# Altium PCB PMP41115.PcbDoc (part 1 of 6)
Units mm, origin at the board's own origin, x right, y up, seen from the top; angles counter-clockwise.
Board outline 102.92 x 46.74 mm, 4 copper layers (Top Layer, Signal Layer 1, Signal Layer 2, Bottom Layer), stack 1.016 mm thick; 174 components, 114 nets, 547 pads, 2622 vias.
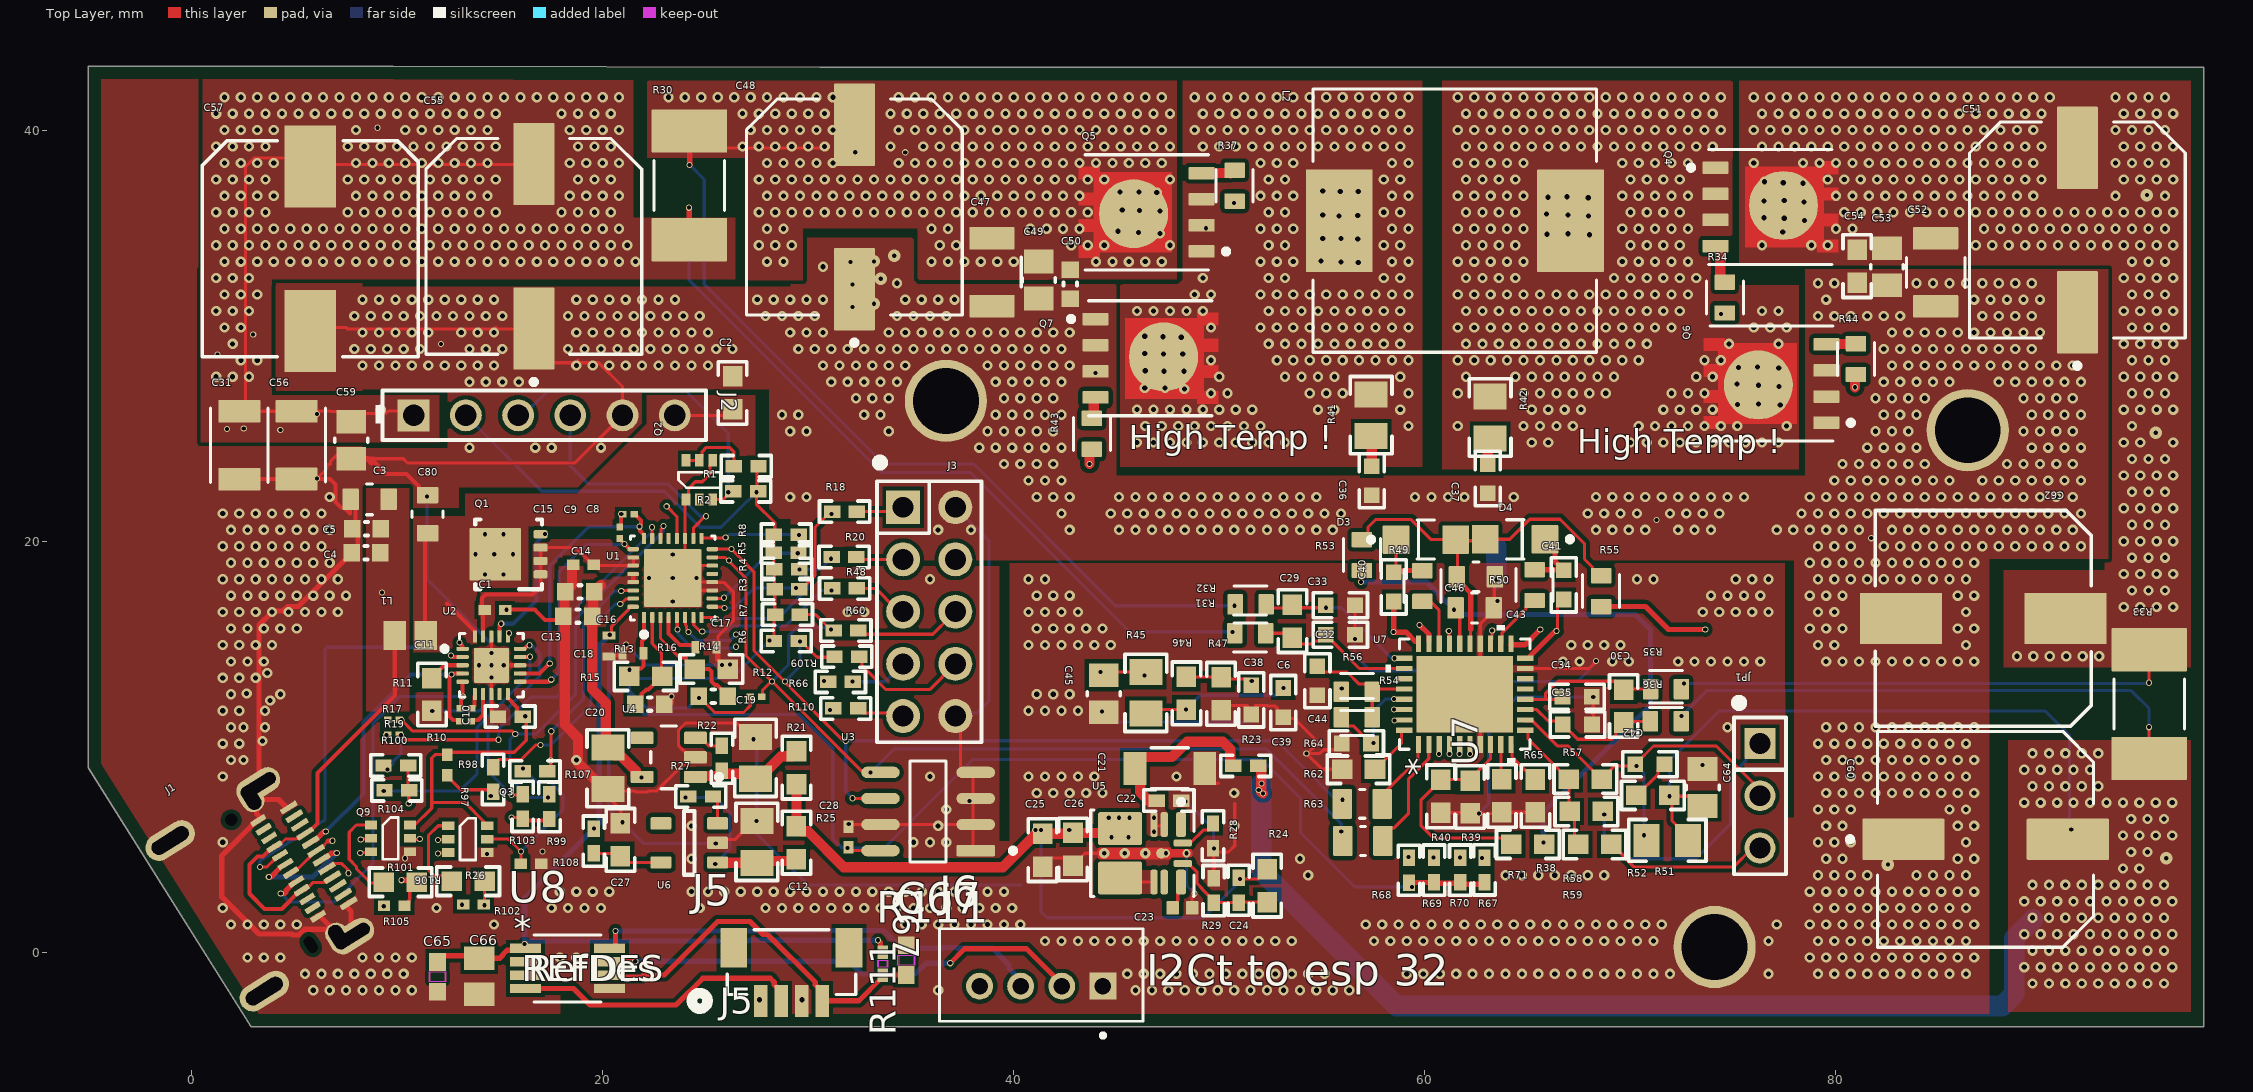
[diagram p0: Top Layer view]
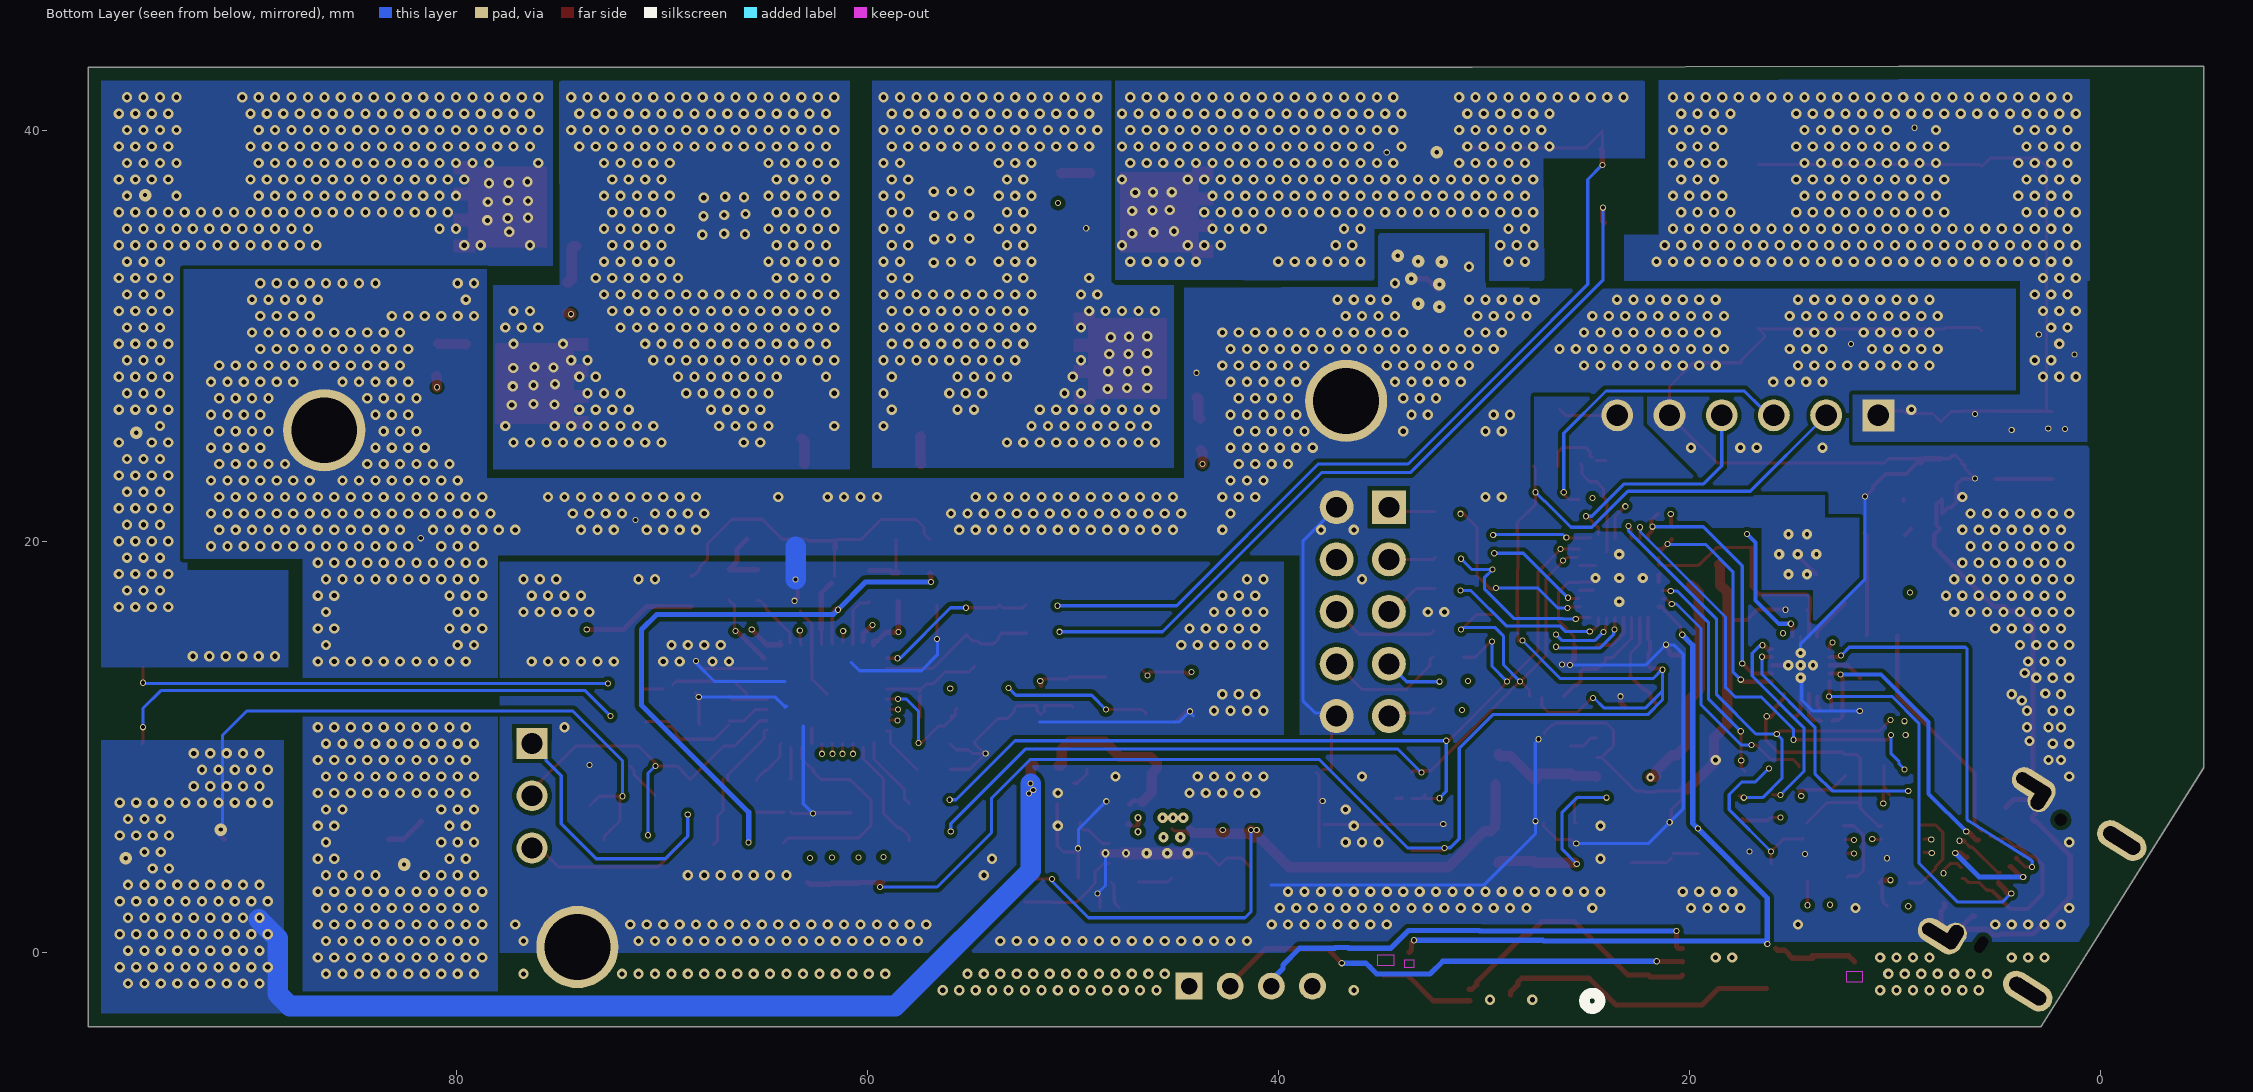
[diagram p1: Bottom Layer view, seen from below]
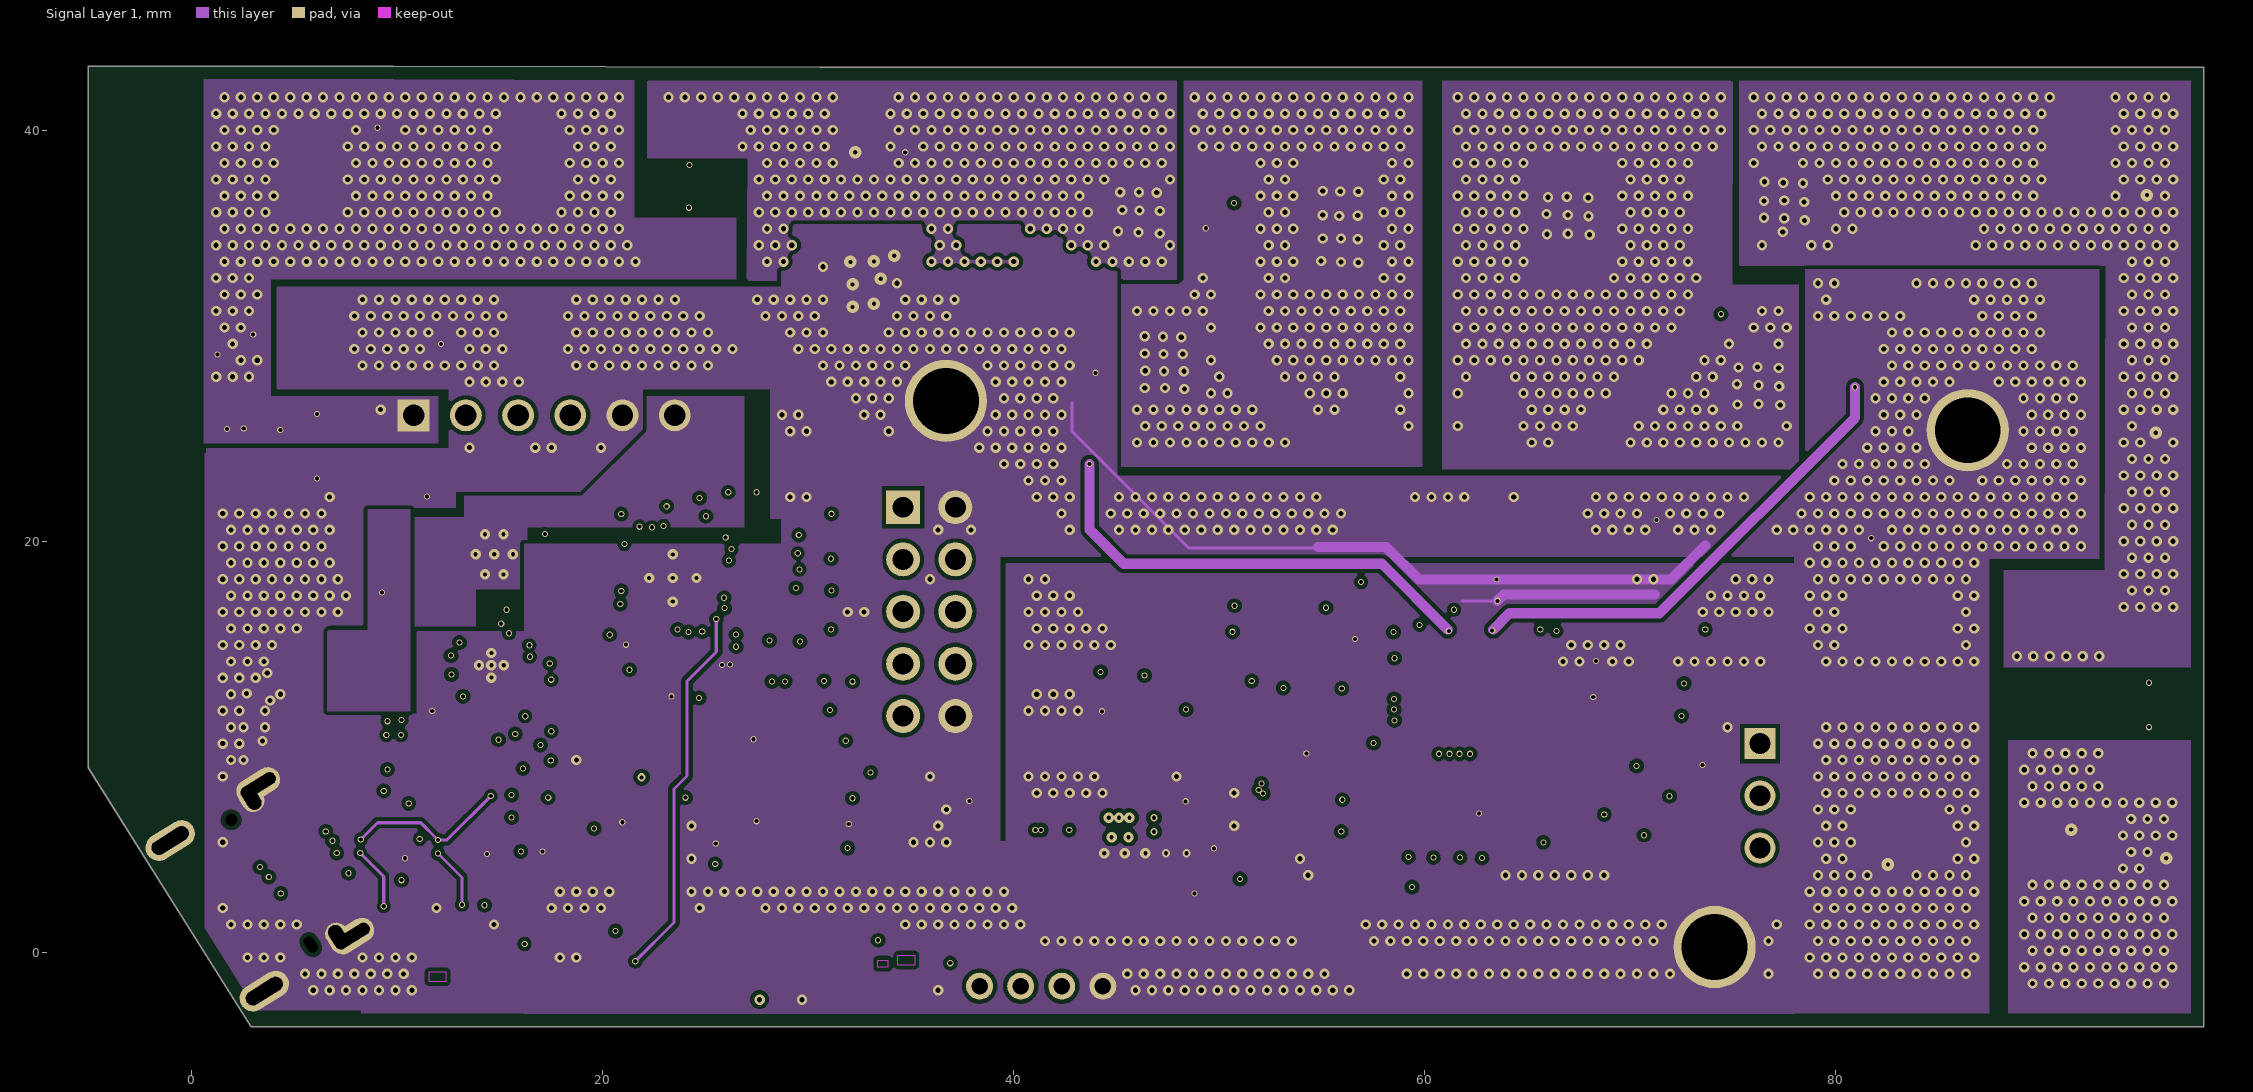
[diagram p2: Signal Layer 1]
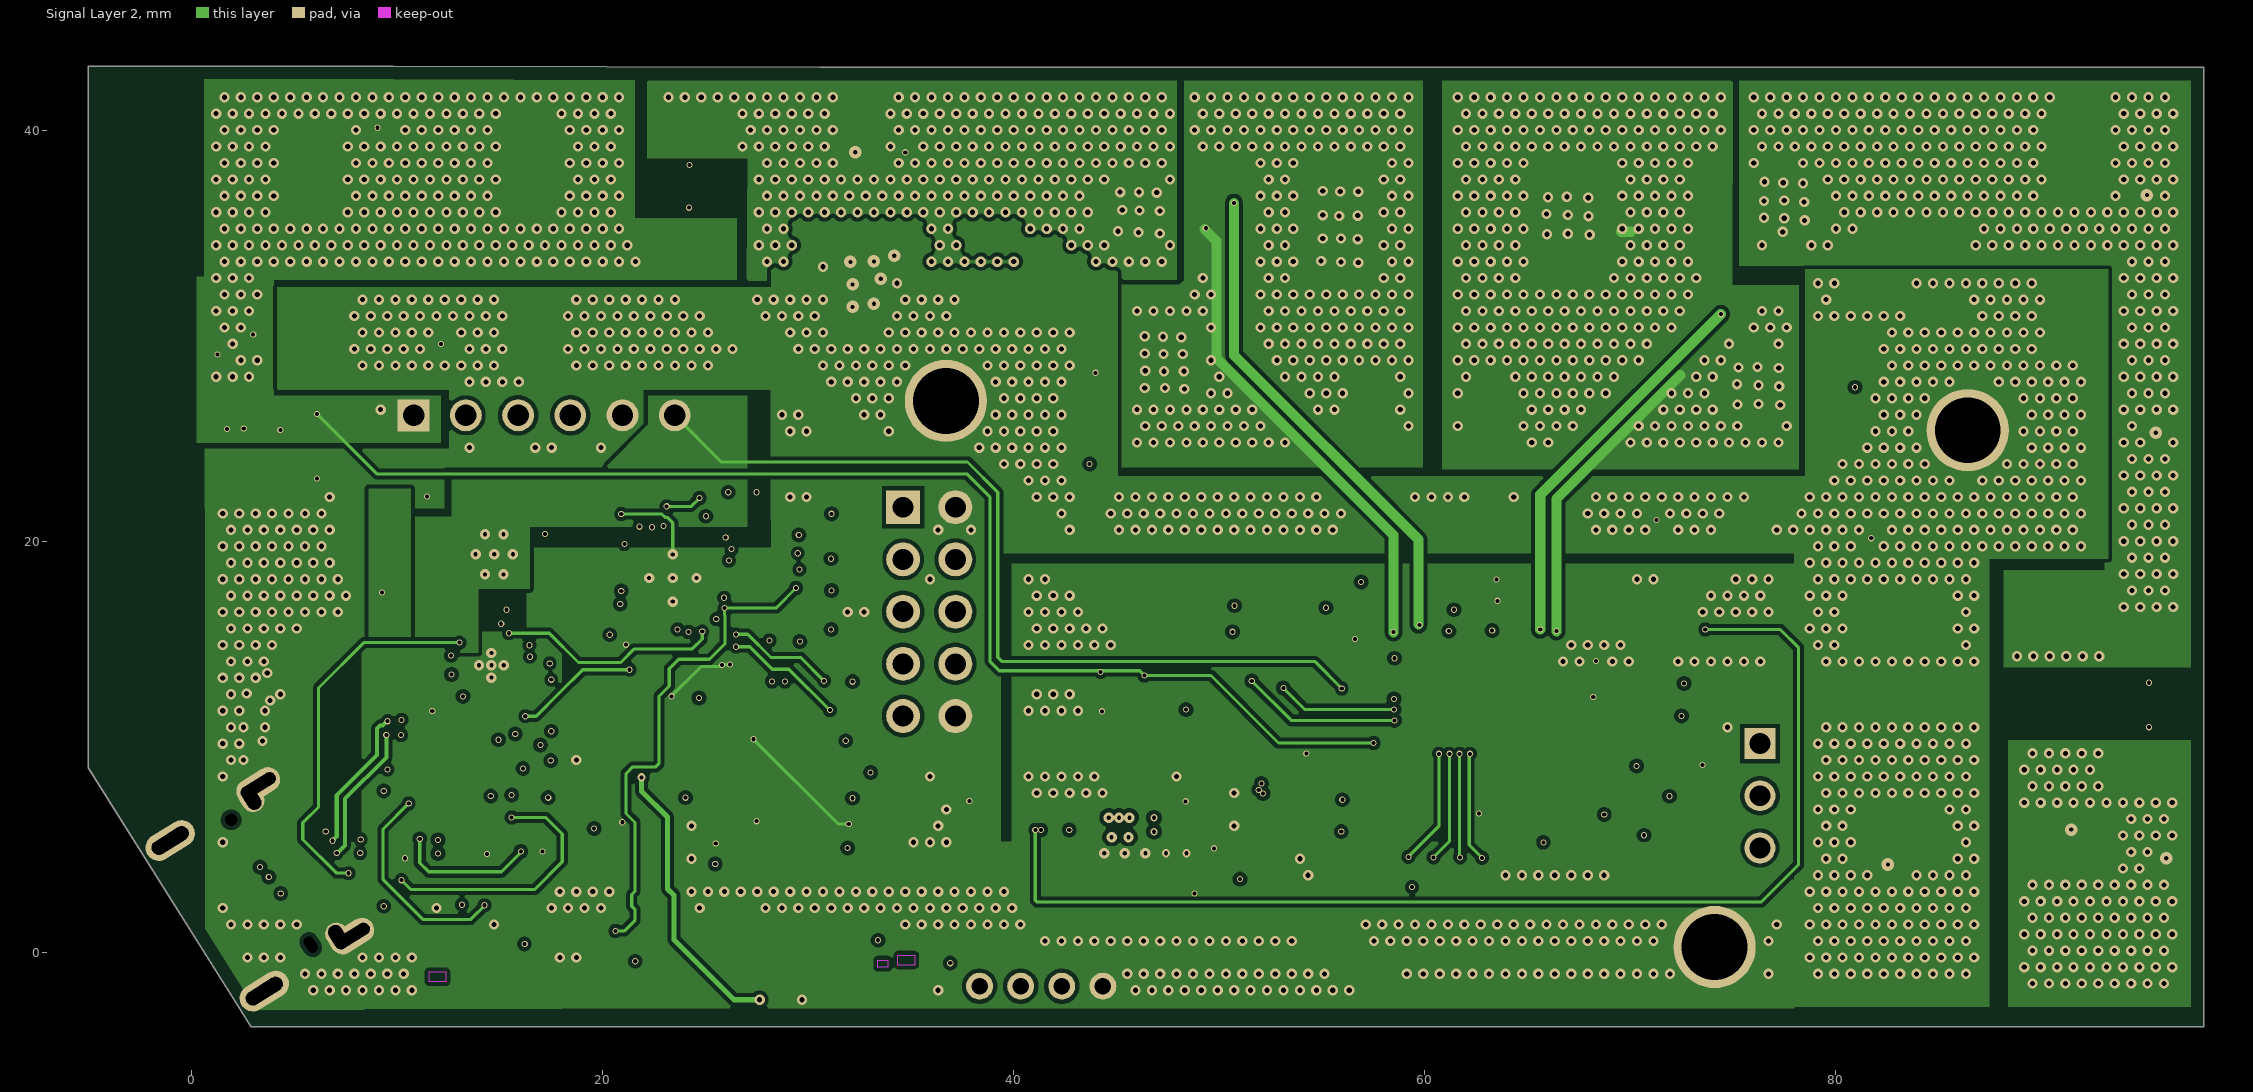
[diagram p3: Signal Layer 2]

## Layer stack, top to bottom
Top Solder: solder mask 0.0102, Solder Resist, Dk 3.5
Top Layer: signal copper 0.0356
Dielectric 1: prepreg 0.127, FR-4 High Tg, Dk 4.2
Signal Layer 1: signal copper 0.0356
Dielectric 2: core 0.6198, FR-4 High Tg, Dk 4.2
Signal Layer 2: signal copper 0.0356
Dielectric 3: prepreg 0.127, FR-4 High Tg, Dk 4.2
Bottom Layer: signal copper 0.0356
Bottom Solder: solder mask 0.0102, Solder Resist, Dk 3.5

## Board outline
2.925,-3.607 -5.004,9 -5.004,8.966 -5.004,43.129 9.83,43.129 30.582,43.078 97.917,43.078 97.917,-3.607 70.739,-3.607

## Design rules (kind name [scope] priority, off if disabled: settings)
AcuteAngle [All] p1: minimum=4.50000000000000E+0001 checktracksonly=FALSE
AssemblyTestPointUsage [All] p1: valid=2
BoardOutlineClearance BoardOutlineClearance_MountingHoles [OnCopper and InComponentClass('Mounting Holes')] p1: gap=0.5 ignorepadtopadclearanceinfootprint=FALSE
BoardOutlineClearance BoardOutlineClearance_Poly [OnCopper and IsPoly] p2: gap=0.635 ignorepadtopadclearanceinfootprint=FALSE
BoardOutlineClearance [OnCopper and Not InComponentClass('Logo') and not InComponentClass('FiducialMark') and not InRegion(1000,500,4000,800) and not InPoly] p3: gap=0.5 ignorepadtopadclearanceinfootprint=FALSE
Clearance "Stitching GND" [IsStitchingVia and InNet('GND') vs (IsVia and (Not IsStitchingVia)) Or IsPad] p1: gap=0.25 ignorepadtopadclearanceinfootprint=FALSE
Clearance Clearance_Keepouts [((IsTrack Or IsArc) And Not InPoly) And IsFree and IsKeepOut vs ((IsTrack Or IsArc) And Not InPoly) And IsFree and IsKeepOut] p2: gap=0.1 ignorepadtopadclearanceinfootprint=FALSE
Clearance Clearance_Poly [InPolygon] p3: gap=0.2 ignorepadtopadclearanceinfootprint=TRUE
Clearance Clearance_FiducialMark [IsKeepOut and InComponentClass('FiducialMark') vs IsPad and InComponentClass('FiducialMark')] p4: gap=0.1 ignorepadtopadclearanceinfootprint=FALSE
Clearance [All] p5: gap=0.2 ignorepadtopadclearanceinfootprint=TRUE
ComponentClearance ComponentClearance_MountingHoles_FiducialMarks [InComponentClass('Mounting Holes') vs InComponentClass('FiducialMark')] p1: gap=1.27 collisioncheckmode=3 verticalgap=0.254 showdistances=FALSE
ComponentClearance ComponentClearance_Shunt [InComponentClass('Header') vs InComponentClass('Shunt')] p2: gap=0 collisioncheckmode=3 verticalgap=0 showdistances=FALSE
ComponentClearance ComponentClearance_Logo [InComponentClass('Logo')] p3: gap=0.762 collisioncheckmode=3 verticalgap=0.254 showdistances=FALSE
ComponentClearance ComponentClearance_ScrewToNut [(HasFootprint('NY PMS 440 0025 PH')) vs (HasFootprint('Keystone_1902C'))] p4: gap=0.127 collisioncheckmode=3 verticalgap=0.254 showdistances=FALSE
ComponentClearance ComponentClearance_MountingHoles [InComponentClass('Mounting Holes')] p5: gap=2.54 collisioncheckmode=3 verticalgap=2540 showdistances=FALSE
ComponentClearance ComponentClearance_SmallPassives [HasFootprint('0201*') or HasFootprint('0402*') or HasFootprint('0508') or HasFootprint('0603*') or HasFootprint('0612') or HasFootprint('0805*') or HasFootprint('0815*') or HasFootprint('0830*') or HasFootprint('1206*') or HasFootprint('1210*') or HasFootprint('1808*') or HasFootprint('1812*') or HasFootprint('1825*') or HasFootprint('2010*') or HasFootprint('2220*') or HasFootprint('2225*') or HasFootprint('2512*') or HasFootprint('2728*') or HasFootprint('3518*') vs HasFootprint('0201*') or HasFootprint('0402*') or HasFootprint('0508') or HasFootprint('0603*') or HasFootprint('0612') or HasFootprint('0805*') or HasFootprint('0815*') or HasFootprint('0830*') or HasFootprint('1206*') or HasFootprint('1210*') or HasFootprint('1808*') or HasFootprint('1812*') or HasFootprint('1825*') or HasFootprint('2010*') or HasFootprint('2220*') or HasFootprint('2225*') or HasFootprint('2512*') or HasFootprint('2728*') or HasFootprint('3518*')] p6: gap=0.2 collisioncheckmode=3 verticalgap=0.254 showdistances=FALSE
ComponentClearance ComponentClearance_THtoSMT [IsThruComponent vs IsSMTComponent] p7: gap=0.762 collisioncheckmode=3 verticalgap=0.254 showdistances=FALSE
ComponentClearance ComponentClearance_THtoTH [IsThruComponent vs IsThruComponent] p8: gap=0.254 collisioncheckmode=3 verticalgap=0.254 showdistances=FALSE
ComponentClearance [All] p9: gap=0.254 collisioncheckmode=3 verticalgap=0.254 showdistances=FALSE
DiffPairsRouting [All] p1: maxlimit=2.54 minlimit=0.254 mostfreqgap=0.254 toplayer_minwidth=0.381 toplayer_maxwidth=0.381 toplayer_prefwidth=0.381 midlayer1_minwidth=0.381 midlayer1_maxwidth=0.381 midlayer1_prefwidth=0.381 midlayer2_minwidth=0.381 midlayer2_maxwidth=0.381 midlayer2_prefwidth=0.381 bottomlayer_minwidth=0.381 bottomlayer_maxwidth=0.381 bottomlayer_prefwidth=0.381 maxuncoupledlength=25.4
FabricationTestPointUsage TestPointUsage [All] p1: valid=2 allowmultiple=FALSE
FabricationTestpoint Testpoint [All] p1: side=3 testpointundercomponent=TRUE minsize=1.016 maxsize=2.54 preferedsize=1.524 minholesize=0 maxholesize=1.016 preferedholesize=0.813 testpointgrid=0.025 allowsidetop=TRUE allowsidebottom=TRUE usegrid=TRUE gridtolerance=0
FanoutControl Fanout_LCC [IsLCC] p1: bgadir=Out bgaviamode=Centered fanoutstyle=Auto fanoutdirection=Alternating viagrid=0.025 // Fanout_LCC (Default Rule)
FanoutControl Fanout_BGA [IsBGA] p2: bgadir=Out bgaviamode=Centered fanoutstyle=Auto fanoutdirection=Alternating viagrid=0.025 // Fanout_BGA (Default Rule)
FanoutControl Fanout_Default [All] p4: bgadir=Out bgaviamode=Centered fanoutstyle=Auto fanoutdirection=Alternating viagrid=0.025 // Fanout_Default (Default Rule)
FanoutControl Fanout_Small [(CompPinCount < 5)] p5: bgadir=Out bgaviamode=Centered fanoutstyle=Auto fanoutdirection=OutThenIn viagrid=0.025 // Fanout_Small (Default Rule)
HoleSize [All] p1: absolutevalues=TRUE maxlimit=6.375 minlimit=0.1 maxpercent=80.000 minpercent=20.000
MinimumAnnularRing [All] p1: minimumring=0.02
MinimumSolderMaskSliver [All] p1: minsoldermaskwidth=0.01
PlaneConnect [All] p1: planeconnectstyle=Direct reliefexpansion=0.254 reliefentries=4 reliefconductorwidth=0.254 reliefairgap=0.254
PolygonConnect [All] p1: connectstyle=Direct reliefconductorwidth=0.254 reliefentries=4 polygonreliefangle="90 Angle" airgapwidth=0.254
RoutingVias ThermalPadVias [IsVia and InAnyComponent] p1: holewidth=0.2 width=0.5 viastyle="Through Hole" minholewidth=0.1 minwidth=0.1 maxholewidth=0.33 maxwidth=0.6
RoutingVias [All] p2: holewidth=0.406 width=0.864 viastyle="Through Hole" minholewidth=0.2 minwidth=0.1 maxholewidth=1.016 maxwidth=1.651
SilkToBoardRegionClearance [Not ((IsComment or IsDesignator) And (Hide <> 'False')) and not InRegion(1000,500,4000,800)] p1:
SolderMaskExpansion [All] p1: expansion=0.05 istentingtop=FALSE
SupplyNets "Schematic Supply Nets_37" [InNet('HIDRV2')] p1: voltage=0.000
SupplyNets "Schematic Supply Nets_36" [InNet('SRN')] p2: voltage=0.000
SupplyNets "Schematic Supply Nets_35" [InNet('LDO_1V5')] p3: voltage=0.000
SupplyNets "Schematic Supply Nets_34" [InNet('VBUS_LV')] p4: voltage=0.000
SupplyNets "Schematic Supply Nets_33" [InNet('PP_EN')] p5: voltage=0.000
SupplyNets "Schematic Supply Nets_32" [InNet('E_Fuse Source')] p6: voltage=0.000
SupplyNets "Schematic Supply Nets_31" [InNet('ACUV')] p7: voltage=0.000
SupplyNets "Schematic Supply Nets_30" [InNet('P_OUT')] p8: voltage=0.000
SupplyNets "Schematic Supply Nets_29" [InNet('STAT1')] p9: voltage=0.000
SupplyNets "Schematic Supply Nets_28" [InNet('FSW_SYNC')] p10: voltage=0.000
SupplyNets "Schematic Supply Nets_27" [InNet('VBUS')] p11: voltage=0.000
SupplyNets "Schematic Supply Nets_26" [InNet('ACN')] p12: voltage=0.000
SupplyNets "Schematic Supply Nets_25" [InNet('GND')] p13: voltage=0.000
SupplyNets "Schematic Supply Nets_24" [InNet('LDO_3V3')] p14: voltage=0.000
SupplyNets "Schematic Supply Nets_23" [InNet('SRP')] p15: voltage=0.000
SupplyNets "Schematic Supply Nets_22" [InNet('FB')] p16: voltage=0.000
SupplyNets "Schematic Supply Nets_21" [InNet('DRV_SUP')] p17: voltage=0.000
SupplyNets "Schematic Supply Nets_20" [InNet('HIDRV1')] p18: voltage=0.000
SupplyNets "Schematic Supply Nets_19" [InNet('BAT')] p19: voltage=0.000
SupplyNets "Schematic Supply Nets_18" [InNet('VSYS')] p20: voltage=0.000
SupplyNets "Schematic Supply Nets_17" [InNet('BTST2')] p21: voltage=0.000
SupplyNets "Schematic Supply Nets_16" [InNet('LODRV2')] p22: voltage=0.000
SupplyNets "Schematic Supply Nets_15" [InNet('ACOV')] p23: voltage=0.000
SupplyNets "Schematic Supply Nets_14" [InNet('ILIM_HIZ')] p24: voltage=0.000
SupplyNets "Schematic Supply Nets_13" [InNet('STAT2')] p25: voltage=0.000
SupplyNets "Schematic Supply Nets_12" [InNet('FBG')] p26: voltage=0.000
SupplyNets "Schematic Supply Nets_11" [InNet('BTST1')] p27: voltage=0.000
SupplyNets "Schematic Supply Nets_10" [InNet('/INT')] p28: voltage=0.000
SupplyNets "Schematic Supply Nets_9" [InNet('ACP')] p29: voltage=0.000
SupplyNets "Schematic Supply Nets_8" [InNet('SW2')] p30: voltage=0.000
SupplyNets "Schematic Supply Nets_7" [InNet('/PG')] p31: voltage=0.000
SupplyNets "Schematic Supply Nets_6" [InNet('TS')] p32: voltage=0.000
SupplyNets "Schematic Supply Nets_5" [InNet('PPHV')] p33: voltage=0.000
SupplyNets "Schematic Supply Nets_4" [InNet('ICHG')] p34: voltage=0.000
SupplyNets "Schematic Supply Nets_3" [InNet('LODRV1')] p35: voltage=0.000
SupplyNets "Schematic Supply Nets_2" [InNet('REGN')] p36: voltage=0.000
SupplyNets "Schematic Supply Nets_1" [InNet('VIN_3V3')] p37: voltage=0.000
SupplyNets "Schematic Supply Nets" [InNet('SW1')] p38: voltage=0.000
UnRoutedNet [All] p1: checkbadconnections=TRUE
Width [All] p1: maxlimit=10 minlimit=0.1 preferedwidth=0.254 checkconnectedcopper=TRUE
16 further rules are at their usual default settings.

## Classes and differential pairs
component class "2_PD Control TPS26750": C1 C2 C3 C4 C5 C8 C9 C10 C11 C12 C13 C14 C15 C16 C17 C18 C65 C66 C67 C80 J1 J2 J3 J5 J6 L1 Q1 Q2 Q3 Q9 R1 R2 R3 R4 R5 R6 R7 R8 R10 R11 R12 R13 R14 R15 R16 R17 R18 R19 R20 R48 R60 R66 R97 R98 R99 R100 R101 R102 R103 R104 R105 R106 R107 R108 R109 R110 R111 U1 U2 U3 U8
component class "4_PP5V Bias": C19 C20 C21 C22 C23 C24 C25 C26 C27 C28 R21 R22 R23 R24 R25 R26 R27 R28 R29 U4 U5 U6
net class LV: GND LODRV1 LODRV2
net class HV: ACN ACP ACUV HIDRV1 NetC36_1 NetC40_2 NetQ5_4 SW1 VSYS
net class HHV: BAT HIDRV2 NetC37_1 NetC41_1 NetQ4_4 P_OUT SRN SRP SW2
component class Header: J3 JP1
component class "3_BQ25756 Charger": C6 C29 C30 C31 C32 C33 C34 C35 C36 C37 C38 C39 C40 C41 C42 C43 C44 C45 C46 C47 C48 C49 C50 C51 C52 C53 C54 C55 C56 C57 C59 C60 C62 C64 D3 D4 JP1 L2 Q4 Q5 Q6 Q7 R30 R31 R32 R33 R34 R35 R36 R37 R38 R39 R40 R41 R42 R43 R44 R45 R46 R47 R49 R50 R51 R52 R53 R54 R55 R56 R57 R58 R59 R62 R63 R64 R65 R67 R68 R69 R70 R71 U7

## Components (designator, comment, footprint, x,y, rotation, side; value= is the part's Value field where it differs from the comment)
C1 "C1005X5R1H104K050BB" 0402L 14.783,16.678 r0 top value=0.1uF
C2 "GRM188R72A104KA35J" 0603 26.344,27.234 r90 top value=0.1uF
C3 "C2012X5R2A475K125AC" FP-C2012X5R2A475K125AC_0805-MFG 8.687,22.059 r0 top value=4.7µF
C4 "C0603X103K1RACTU" 0603L 8.509,19.456 r180 top value=0.01uF
C5 "C0603X103K1RACTU" 0603L 8.534,20.625 r180 top value=0.01uF
C6 "HMK107B7104KAHT" 0603_HV 54.796,13.231 r90 top value=0.1uF
C8 "CGA1A2X7R1H221K030BA" 0201_033L 20.854,20.431 r90 top value=220pF
C9 "CGA1A2X7R1H221K030BA" 0201_033L 21.273,21.337 r180 top value=220pF
C10 "885012205037" 0402 15.533,11.483 r180 top value=0.1uF
C11 "GRM188R72A104KA35J" 0603 11.717,12.563 r90 top value=0.1uF
C12 "CGA2B3X7R1H104K050BB" 0402L 31.979,5.629 r90 top value=0.1uF
C13 "GRM188R61E106MA73D" 0603L 18.816,16.379 r180 top value=10uF
C14 "GRM188R61E106MA73D" 0603L 18.911,17.554 r180 top value=10uF
C15 "C1005X5R1H104K050BB" 0402L 19.087,18.877 r180 top value=0.1uF
C16 "CL05A106MP5NUNC" 0402_070 21.503,14.578 r0 top value=10uF
C17 "CL05A106MP5NUNC" 0402_070 25.05,14.864 r180 top value=10uF
C18 "CL05A106MP5NUNC" 0402_070 20.333,14.926 r270 top value=10uF
C19 "C2012X7S2A105K125AB" 0805_HV 27.46,9.48 r90 top value=1uF
C20 "C2012X7S2A105K125AB" 0805_HV 20.278,8.974 r270 top value=1uF
C21 "C3216X7S2A225K160AB" 1206_180 47.619,8.968 r0 top value=2.2uF
C22 "GRM155R62A104KE14D" 0402 47.57,7.402 r0 top value=0.1uF
C23 "0402YD105KAT2A" FP-0402YD105KAT2A_0402-IPC_B 48.223,2.184 r0 top value=1µF
C24 "C0402C100C8GACTU" 0402 50.965,3.043 r270 top value=10pF
C25 "CL10A226MP8NUNE" 0603 41.423,4.99 r270 top value=22uF
C26 "CL10A226MP8NUNE" 0603 42.906,5.027 r270 top value=22uF
C27 "CGA3E3X5R1A225K080AB" 0603 20.888,5.493 r90 top value=2.2uF
C28 "C2012X7S2A105K125AB" 0805_HV 27.531,5.391 r90 top value=1uF
C29 "C0603C474K4RACTU" 0603 53.581,16.129 r90 top value=0.47uF
C30 "C0603C474K4RACTU" 0603 69.694,12 r270 top value=0.47uF
C31 "GCJ32DC72A475KE01L" FP-GCJ32DC72A475KE01L_1210-MFG 2.349,24.689 r90 top value=4.7µF
C32 "HMK107B7104KAHT" 0603_HV 55.909,15.467 r0 top value=0.1uF
C33 "HMK107B7104KAHT" 0603_HV 55.912,16.902 r0 top value=0.1uF
C34 "HMK107B7104KAHT" 0603_HV 67.426,12.454 r0 top value=0.1uF
C35 "HMK107B7104KAHT" 0603_HV 67.446,11.106 r0 top value=0.1uF
C36 "06031A330JAT2A" 0603_HV 57.442,22.962 r270 top value=33pF
C37 "06031A330JAT2A" 0603_HV 63.077,23.068 r270 top value=33pF
C38 "HMK107B7104KAHT" 0603_HV 53.138,12.168 r270 top value=0.1uF
C39 "HMK107B7104KAHT" 0603_HV 51.571,12.304 r270 top value=0.1uF
C40 "06033C104KAT2A" 0603_HV 58.507,17.802 r90 top value=0.1uF
C41 "06033C104KAT2A" 0603_HV 66.774,17.897 r270 top value=0.1uF
C42 "GCM1885C2A101JA16D" 0603_HV 70.967,9.17 r180 top value=100pF
C43 "CGA4J1X7R1E475K125AE" FP-CGA4J1X7R1E475K125AE_0805-MFG 62.508,18.288 r0 top value=4.7µF
C44 "HMK107B7104KAHT" 0603_HV 56.689,10.182 r0 top value=0.1uF
C45 "08051C105K4Z2A" 0805_150 44.406,12.606 r270 top value=1uF
C46 "CGA4J1X7R1E475K125AE" FP-CGA4J1X7R1E475K125AE_0805-MFG 62.442,16.776 r0 top value=4.7µF
C47 "C3225X7R2A106K250AC" FP-C3225X7R2A106K250AC_1210-MFG 38.961,33.11 r90 top value=10µF
C48 "PCR1J101MCL1GS" FP-PCR1J101MCL1GS_SMD_RADIAL-MFG 32.268,36.279 r90 top
C49 "08051C105K4Z2A" 0805_150 41.237,32.728 r270 top value=1uF
C50 "HMK107B7104KAHT" 0603L 42.769,32.526 r270 top value=0.1uF
C51 "PCR1J101MCL1GS" FP-PCR1J101MCL1GS_SMD_RADIAL-MFG 91.764,35.157 r90 top
C52 "C3225X7R2A106K250AC" FP-C3225X7R2A106K250AC_1210-MFG 84.871,33.1 r90 top value=10µF
C53 "08051C105K4Z2A" 0805_150 82.504,33.366 r270 top value=1uF
C54 "CGA3E2C0G2A101J080AA" 0603 81.052,33.399 r270 top value=100pF
C55 "PCR1J101MCL1GS" FP-PCR1J101MCL1GS_SMD_RADIAL-MFG 16.675,34.365 r90 top
C56 "GCJ32DC72A475KE01L" FP-GCJ32DC72A475KE01L_1210-MFG 5.138,24.696 r270 top value=4.7µF
C57 "EEHZC1J560P" SM_RADIAL_10BMM 5.796,34.248 r270 top value=56uF
C59 "08051C105K4Z2A" 0805_150 7.79,24.931 r270 top value=1uF
C60 "PCR1J101MCL1GS" FP-PCR1J101MCL1GS_SMD_RADIAL-MFG 87.302,5.519 r0 top
C62 "EEHZC1J560P" SM_RADIAL_10BMM 87.182,16.262 r180 top value=56uF
C64 "08051C105K4Z2A" 0805_150 73.532,8.038 r90 top value=1uF
C65 "0.1u" G-188_MUR 11.989,-1.168 r90 top
C66 "1u" CAPC2012X145N 14.021,-1.143 r90 top
C67 "0.1u" G-188_MUR 34.798,-0.356 r270 top
C80 "C2012X5R2A475K125AC" FP-C2012X5R2A475K125AC_0805-MFG 11.506,21.336 r270 top value=4.7µF
D3 "V1FM10-M3/H" FP-V1FM10-M3-H_DO-219AB-MFG 60.072,20.096 r180 top
D4 "V1FM10-M3/H" FP-V1FM10-M3-H_DO-219AB-MFG 64.412,20.114 r0 top
J1 "DX07S024JJ2R1300" JAE_DX07S024JJ2R1300 -0.253,0.842 r302 top
J2 "SSW-106-01-T-S" Samtec_SSW-106-01-x-S 17.181,26.141 r0 top
J3 "PEC05DAAN" CONN_PEC05DAAN 35.912,16.594 r270 top
J5 "BM04B-SRSS-TB" CONN4_BM04B-SRSS_JST 29.21,-0.457 r0 top
J6 "B4B-PH-K-S" JST_B4B-PH-K-S 41.361,-1.076 r0 top
JP1 "PEC03SAAN" CONN_PEC03SAAN 76.325,7.635 r270 top
L1 "742792021" 0805L 10.662,15.429 r180 top value="22 ohm"
L2 "CMLB135T-100MS" FP-CMLB135T-100MS_SMT2_13MM45_12Mm6-MFG 61.481,35.612 r0 top value=10uH
Q1 "CSD18543Q3A" DNH0008A 15.449,19.384 r180 top value=60V
Q2 "2N7002DW" SOT-363 24.729,23.002 r90 top value=60V
Q3 "2N7002DW" SOT-363 13.467,5.527 r0 top value=60V
Q4 "SIR880BDP-T1-RE3" FP-SIR880BDP-T1-RE3_SO-8-MFG 76.825,36.283 r0 top
Q5 "SIR880BDP-T1-RE3" FP-SIR880BDP-T1-RE3_SO-8-MFG 46.497,36.024 r180 top
Q6 "SIR880BDP-T1-RE3" FP-SIR880BDP-T1-RE3_SO-8-MFG 76.888,27.691 r180 top
Q7 "SIR880BDP-T1-RE3" FP-SIR880BDP-T1-RE3_SO-8-MFG 46.665,28.918 r0 top
Q9 "2N7002DW" SOT-363 9.703,5.563 r0 top value=60V
R1 "ERJ-2RKF1001X" 0402 27.005,23.666 r0 top value=1.00k
R2 "ERJ-2RKF1001X" 0402 26.987,22.45 r0 top value=1.00k
R3 "RC0402FR-072K2L" 0402 28.991,17.685 r180 top value=2.20k
R4 "RC0402FR-072K2L" 0402 28.979,18.664 r180 top value=2.20k
R5 "CRCW040210K0DHEDP" 0402 28.952,19.464 r180 top value=10.0k
R6 "RC0402FR-072K2L" 0402 28.961,15.164 r180 top value=2.20k
R7 "RC0402FR-072K2L" 0402 29.017,16.45 r180 top value=2.20k
R8 "CRCW040210K0DHEDP" 0402 28.954,20.334 r180 top value=10.0k
R10 "CRCW02010000Z0ED" 0201L 13.344,11.271 r180 top value=0
R11 "CRCW02010000Z0ED" 0201L 13.383,11.887 r180 top value=0
R12 "RC0201FS-7D100KL" 0201L 27.488,12.458 r180 top value=100k
R13 "RT0603BRD07470RL" 0603 22.113,13.448 r180 top value=470
R14 "RC0603FR-07100KL" 0603L 25.405,12.483 r180 top value=100k
R15 "RC0603FR-07100KL" 0603L 22.316,12.099 r180 top value=100k
R16 "RT0603BRD07470RL" 0603 25.313,13.801 r180 top value=470
R17 "CRCW02010000Z0ED" 0201L 9.85,11.334 r180 top value=0
R18 "RC0402JR-070RL" 0402 31.795,21.459 r0 top value=0
R19 "CRCW02010000Z0ED" 0201L 9.844,10.601 r180 top value=0
R20 "RC0402JR-070RL" 0402 31.769,19.249 r0 top value=0
R21 "RC0603JR-070RL" 0603 29.455,9.003 r90 top value=0
R22 "CMP-0027004-2" 0402 25.825,9.462 r270 top value=0
R23 "CMP-0027004-2" 0402 51.307,9.092 r0 top value=0
R24 "RT0603BRD0760K4L" 0603 52.352,3.26 r90 top value=60.4k
R25 "RC0603JR-070RL" 0603 29.452,5.357 r270 top value=0
R26 "CMP-0027004-2" 0402 19.594,5.433 r270 top value=0
R27 "CMP-0027004-2" 0402 24.791,7.6 r180 top value=0
R28 "CRCW040219K6FKED" 0402 49.714,5.687 r90 top value=19.6k
R29 "ERJ-2RKF1002X" 0402 49.752,3.023 r270 top value=10.0k
R30 "WSL25125L000FEA" FP-WSL25125L000FEA_2512-MFG 24.243,37.334 r90 top value=5m
R31 "CRCW060310R0FKEB" FP-CRCW060310R0FKEB_0603-MFG 51.527,15.539 r180 top value=10
R32 "CRCW060310R0FKEB" FP-CRCW060310R0FKEB_0603-MFG 51.548,16.944 r180 top value=10
R33 "WSL25125L000FEA" FP-WSL25125L000FEA_2512-MFG 95.26,12.096 r270 top value=5m
R34 "CRCW06030000Z0EA" FP-CRCW06031R50FKEAHP_0603-MFG 74.615,31.873 r270 top value=0
R35 "CRCW060310R0FKEB" FP-CRCW060310R0FKEB_0603-MFG 71.753,12.823 r180 top value=10
R36 "CRCW060310R0FKEB" FP-CRCW060310R0FKEB_0603-MFG 71.743,11.258 r180 top value=10
R37 "CRCW06030000Z0EA" FP-CRCW06031R50FKEAHP_0603-MFG 50.768,37.313 r270 top value=0
R38 "RC0603FR-075K23L" 0603 65.033,5.273 r0 top value=5.23k
R39 "ERJ-3EKF1002V" 0603 62.223,7.577 r90 top value=10.0k
R40 "RC0603FR-0730K1L" 0603 60.8,7.607 r90 top value=30.1k
R41 "RC0805JR-072R2L" 0805_HV 57.406,26.15 r90 top value=2.2
R42 "RC0805JR-072R2L" 0805_HV 63.198,26.036 r90 top value=2.2
R43 "CRCW06030000Z0EA" FP-CRCW06031R50FKEAHP_0603-MFG 43.822,25.246 r90 top value=0
R44 "CRCW06030000Z0EA" FP-CRCW06031R50FKEAHP_0603-MFG 80.994,28.878 r90 top value=0
R45 "CRCW08051M00FKEAC" 0805_HV 46.452,12.645 r90 top value=1.00Meg
R46 "RT0603BRD07383KL" 0603 48.421,12.62 r270 top value=383k
R47 "RT0603BRD0731K2L" 0603 50.112,12.595 r90 top value=31.2k
R48 "RC0402JR-070RL" 0402 31.795,17.725 r0 top value=0
R49 "CRCW06030000Z0EA" FP-CRCW06031R50FKEAHP_0603-MFG 59.903,17.84 r90 top value=0
R50 "CRCW06030000Z0EA" FP-CRCW06031R50FKEAHP_0603-MFG 65.362,17.885 r90 top value=0
R51 "CRCW06031R10JNEA" 0603 71.115,7.656 r0 top value=1.1
R52 "ERJ-PB6B2493V" 0805_HV 71.816,5.469 r0 top value=249k
R53 "CRCW06030000Z0EA" FP-CRCW06031R50FKEAHP_0603-MFG 56.961,19.346 r90 top value=0
R54 "CRCW06030000Z0EA" FP-CRCW06031R50FKEAHP_0603-MFG 56.712,11.463 r0 top value=0
R55 "CRCW06030000Z0EA" FP-CRCW06031R50FKEAHP_0603-MFG 68.595,17.591 r90 top value=0
R56 "CRCW06030000Z0EA" FP-CRCW06031R50FKEAHP_0603-MFG 56.71,12.693 r0 top value=0
R57 "RT0603BRD0713K7L" 0603 67.826,8.45 r0 top value=13.7k
R58 "RT0603BRD0730K5L" 0603 67.879,6.873 r0 top value=30.5k
R59 "RT0603BRD0713KL" 0603 68.282,5.272 r0 top value=13.0k
R60 "RC0402JR-070RL" 0402 31.858,15.676 r180 top value=0
R62 "RC0603FR-07100KL" 0603 56.796,8.925 r0 top value=100k
R63 "CRCW08050000Z0EA" FP-CRCW080510R0JNEAHP_0805-MFG 57.009,5.44 r180 top value=0
R64 "CRCW08050000Z0EA" FP-CRCW080510R0JNEAHP_0805-MFG 56.98,7.242 r180 top value=0
R65 "RC0603FR-073K6L" 0603 65.399,7.627 r90 top value=3.60k
R66 "RC0402JR-070RL" 0402 31.592,13.178 r0 top value=0
R67 "RC0402FR-0710K5L" 0402 62.921,4.031 r270 top value=10.5k
R68 "RC0402FR-0710K5L" 0402 59.254,4.015 r270 top value=10.5k
R69 "RC0402FR-0710K5L" 0402 60.47,4.023 r270 top value=10.5k
R70 "RC0402FR-0710K5L" 0402 61.743,4.023 r270 top value=10.5k
R71 "RG1608P-822-B-T5" 0603 63.767,7.63 r90 top value=8.20k
R97 "RC1005F104CS" 0402L 12.459,9.138 r90 top value=100k
R98 "RC0402JR-070RL" 0402 14.695,8.429 r270 top value=0
R99 "RC0402JR-070RL" 0402 17.433,7.107 r270 top value=0
R100 "RC0402JR-070RL" 0402 9.962,9.107 r180 top value=0
R101 "RG1608P-2493-B-T5" 0603 10.185,3.429 r180 top value=249k
R102 "RG1608P-2493-B-T5" 0603 13.483,3.48 r180 top value=249k
R103 "RC0402JR-070RL" 0402 16.133,7.117 r270 top value=0
R104 "RC0402JR-070RL" 0402 10.013,7.903 r180 top value=0
R105 "ERJ-2RKF1004X" 0402L 9.886,2.285 r0 top value=1.00Meg
R106 "ERJ-2RKF1004X" 0402L 13.74,2.348 r0 top value=1.00Meg
R107 "RC0402JR-070RL" 0402 16.732,8.825 r180 top value=0
R108 "RC1005F104CS" 0402L 16.532,4.33 r180 top value=100k
R109 "RC0402JR-070RL" 0402 31.902,14.402 r180 top value=0
R110 "RC0402JR-070RL" 0402 31.852,11.887 r0 top value=0
R111 "10k" RC0402N_VIS 33.655,-0.533 r90 top
U1 "TPS26750RSMR" RSM0032B-MFG 23.435,18.232 r90 top
U2 "TPD4S480RUKR" RUK0020B-MFG 14.61,13.984 r0 top
U3 "CAT24C512WI-GT3" FP-CAT24C512WI-GT3_SOIC8-IPC_C 35.857,6.871 r180 top
U4 "TPS7A2450DBVR" DBV0005A-MFG 23.24,9.503 r180 top
U5 "TPSM365R6RDNR" RDN0011A-MFG 46.195,4.839 r270 top
U6 "TPS76333DBVR" DBV0005A_N 24.237,5.344 r180 top
U7 "BQ25756RRVR" VQFN36_RRV_TEX 61.968,12.578 r90 top
U8 "EMC2101-R-ACZL-TR" MSOP8_MC_MCH 18.313,-0.762 r0 top

## Footprints (in the part's own frame and the unit in brackets; to place one, negate y for a bottom-side part, rotate by r counter-clockwise, add the part's x,y. Pads: shape width x height; smd on the part's side, far side on the other; paste and mask are expansions set on the pad)
0201_033L [mm] "0201"
  rect 0.36x0.32 smd mask+0.048: 1(-0.28,0) 2(0.28,0)
  body extent -0.31,-0.16 0.31,0.16, height 0.33
0201L [mm] "Data from Kemet datasheet CC101_COM dated 7/28/11"
  rect 0.36x0.32 smd mask+0.048: 1(-0.28,0) 2(0.28,0)
  body extent -0.31,-0.16 0.31,0.16, height 0.26
0402 [mm] "0402 from SM-752 data"
  rect 0.8x0.6 smd: 1(-0.6,0) 2(0.6,0)
  silkscreen extent -1.22,-0.52 1.22,0.52, body extent -0.55,-0.3 0.55,0.3, height 0.6
0402_070 [mil] "SMD, 2-Leads, Body 1.2x0.7mm, Height 0.7mm"
  rect 15x24 smd: 1(-20,0) 2(20,0)
  body extent -24,-14 24,14, height 28
0402L [mm] "0402 from SM-752 data"
  rect 0.6x0.5 smd: 1(-0.5,0) 2(0.5,0)
  body extent -0.55,-0.3 0.55,0.3, height 0.6
0603 [mm] "0603 from SM-752 data"
  rect 1x0.95 smd: 1(-0.8,0) 2(0.8,0)
  silkscreen extent -1.52,-0.69 1.52,0.69, body extent -0.87,-0.47 0.87,0.47, height 1
0603_HV [mil] "Ernesto recommended land pattern.  26 mil between pads."
  rect 30x30 smd: 1(-28,0) 2(28,0)
  silkscreen extent -52,-24 52,24, body extent -34,-19 34,19, height 39
0603L [mm] "0603 from SM-752 data"
  rect 0.8x0.85 smd: 1(-0.7,0) 2(0.7,0)
  silkscreen extent -0.07,-0.33 0.07,0.33, body extent -0.87,-0.47 0.87,0.47, height 1
0805_150 [mm] "0805 / 1.5 mm height"
  rect 1.15x1.45 smd: 1(-0.9,0) 2(0.9,0)
  silkscreen extent -0.1,-0.8 0.1,0.8, body extent -1.1,-0.72 1.1,0.72, height 1.5
0805_HV [mil] "0805 with 30mil clearance between pads"
  rect 50x63 smd: 1(-40,0) 2(40,0)
  silkscreen extent -74,-40 74,40, body extent -43,-29 43,29, height 57
0805L [mm] "0805 from SM-752 data"
  rect 1.1x1.4 smd: 1(-0.75,0) 2(0.75,0)
  body extent -1.1,-0.72 1.1,0.72, height 1.45
1206_180 [mm] "1206_180"
  rect 1.1x1.6 smd: 1(-1.7,0) 2(1.7,0)
  silkscreen extent -0.9,-1 0.9,1, body extent -1.75,-0.95 1.75,0.95, height 1.8
CAPC2012X145N [mm]
  rect 1.15x1.47 smd: 1(-0.88,0) 2(0.88,0)
CONN4_BM04B-SRSS_JST [mil]
  rect 26x61 smd paste+0 mask+0: 1(-59.06,-74.1) 2(-19.68,-74.1) 3(19.68,-74.1) 4(59.06,-74.1)
  rect 51x75 smd paste+0 mask+0: 5(-110.24,27.47) 6(110.24,27.47)
  silkscreen extent -191,-89 123,62, body extent -113,-95 123,47, height 171
CONN_PEC03SAAN [mm] "SULLINS"
  rect 1.5x1.5 hole 1.016: 1(-2.54,0)
  round 1.5 hole 1.016: 2(0,0) 3(2.54,0)
  silkscreen extent -4.72,-1.27 3.81,1.27, body extent -3.84,-1.3 3.84,1.3, height 8.38
CONN_PEC05DAAN [mm] "SULLINS"
  rect 1.65x1.65 hole 1.016 mask+0: 1(-5.08,-1.27)
  round 1.65 hole 1.016 mask+0: 2(-5.08,1.27) 3(-2.54,-1.27) 4(-2.54,1.27) 5(0,-1.27) 6(0,1.27) 7(2.54,-1.27) 8(2.54,1.27) 9(5.08,-1.27) 10(5.08,1.27)
  silkscreen extent -7.45,-2.6 6.35,2.54, body extent -6.35,-2.54 6.35,2.54, height 8.38
DBV0005A-MFG [mm]
  rrect17% 1.1x0.6 smd paste+0 mask+0: 1(-1.3,0.95) 2(-1.3,0) 3(-1.3,-0.95) 4(1.3,-0.95) 5(1.3,0.95)
  silkscreen extent -2.58,-1.53 0.87,1.53, body extent -1.95,-1.78 1.95,1.78, height 0.25
DBV0005A_N [mm] "SOT23, 5-Leads, Body 2.9x1.6mm, Pitch 0.95mm, Lead Span 2.8mm, IPC Medium Density"
  rrect17% 1x0.6 smd: 1(-1.375,0.95) 2(-1.375,0) 3(-1.375,-0.95) 4(1.375,-0.95) 5(1.375,0.95)
  silkscreen extent -0.25,-1.55 0.25,1.55, body extent -1.42,-1.46 1.42,1.46, height 1.09
DNH0008A [mm] "VSONP-8"
  rrect50% 0.7x0.4 smd paste-0.05 mask-0.05: 1(-1.55,0.975) 2(-1.55,0.325) 3(-1.55,-0.325) 4(-1.55,-0.975) 5(1.55,-0.975) 6(1.55,-0.325) 7(1.55,0.325) 8(1.55,0.975)
  rrect4% 2.51x2.55 smd paste-1.5 mask-1.5: 9(0.645,0)
  rrect14% 0.705x1.125 on Top Paste: 9A(-0.208,0.662) 9B(0.697,0.662) 9C(-0.208,-0.663) 9D(0.697,-0.663)
  silkscreen extent -1.62,-1.7 1.62,1.7, body extent -1.65,-1.65 1.65,1.66, height 0.91
FP-0402YD105KAT2A_0402-IPC_B [mm]
  rrect16% 0.608x0.658 smd paste+0 mask+0: 1(-0.475,0) 2(0.475,0)
  body extent -0.5,-0.25 0.5,0.25, height 0.56
FP-C2012X5R2A475K125AC_0805-MFG [mm]
  rrect13% 0.8x1.05 smd paste+0 mask+0: 1(-0.925,0) 2(0.925,0)
  silkscreen extent -0.15,-0.75 0.15,0.75, body extent -1.43,-0.85 1.43,0.85, height 0.25
FP-C3225X7R2A106K250AC_1210-MFG [mm]
  rrect9% 1.1x2.2 smd paste+0 mask+0: 1(-1.65,0) 2(1.65,0)
  silkscreen extent -0.72,-1.43 0.72,1.43, body extent -1.6,-1.25 1.6,1.25, height 2.85
FP-CAT24C512WI-GT3_SOIC8-IPC_C [mm]
  rrect18% 1.874x0.545 smd paste+0 mask+0: 1(-2.316,1.905)
  rrect100% 1.874x0.545 smd paste+0 mask+0: 2(-2.316,0.635) 3(-2.316,-0.635) 4(-2.316,-1.905) 5(2.316,-1.905) 6(2.316,-0.635) 7(2.316,0.635) 8(2.316,1.905)
  silkscreen extent -4.25,-2.45 0.88,2.45, body extent -3.35,-2.55 3.35,2.55, height 0.25
FP-CGA4J1X7R1E475K125AE_0805-MFG [mm]
  rrect13% 0.8x1.05 smd paste+0 mask+0: 1(-0.925,0) 2(0.925,0)
  silkscreen extent -0.15,-0.72 0.15,0.72, body extent -1.43,-0.82 1.43,0.82, height 0.25
FP-CMLB135T-100MS_SMT2_13MM45_12Mm6-MFG [mm]
  rrect3% 3.25x5 smd paste+0 mask+0: 1(-5.625,0) 2(5.625,0)
  silkscreen extent -6.9,-6.4 6.9,6.4, body extent -7.35,-6.5 7.35,6.5, height 0.25
FP-CRCW06031R50FKEAHP_0603-MFG [mm]
  rrect13% 0.75x1 smd paste+0 mask+0: 1(-0.75,0) 2(0.75,0)
  silkscreen extent -0.8,-0.9 0.8,0.9, body extent -0.8,-0.43 0.8,0.43, height 0.55
FP-CRCW060310R0FKEB_0603-MFG [mm]
  rrect13% 0.75x1 smd paste+0 mask+0: 1(-0.75,0) 2(0.75,0)
  silkscreen extent -0.8,-0.9 0.8,0.9, body extent -1.22,-0.6 1.22,0.6, height 0.25
FP-CRCW080510R0JNEAHP_0805-MFG [mm]
  rrect11% 0.95x1.45 smd paste+0 mask+0: 1(-0.975,0) 2(0.975,0)
  silkscreen extent -0.13,-0.7 0.13,0.7, body extent -1.55,-0.82 1.55,0.82, height 0.25
FP-GCJ32DC72A475KE01L_1210-MFG [mm]
  rrect9% 1.1x2.05 smd paste+0 mask+0: 1(-1.65,0) 2(1.65,0)
  silkscreen extent -1.8,-1.4 1.8,1.4, body extent -1.6,-1.25 1.6,1.25, height 2.3
FP-PCR1J101MCL1GS_SMD_RADIAL-MFG [mm]
  rrect5% 4x2 smd paste+0 mask+0: 1(-4,0) 2(4,0)
  silkscreen extent -6.72,-5.25 5.25,5.25, body extent -6.25,-5.5 6.25,5.5, height 0.25
FP-SIR880BDP-T1-RE3_SO-8-MFG [mil]
  rrect16% 50x24 smd paste+0 mask+0: 1(-105,75) 2(-105,25) 3(-105,-25) 4(-105,-75)
  round 132.13 smd paste+0 mask+0: 5-6-7-8(25.41,2.72)
  Top Layer region: -48,77 90,77 90,87 130,87 130,63 102,63 102,37 130,37 130,13 102,13 102,-13 130,-13 130,-37 102,-37 102,-63 130,-63 130,-87 90,-87 90,-77 -48,-77
  silkscreen extent -157,-110 118,110, body extent -120,-102 122,101, height 46
FP-V1FM10-M3-H_DO-219AB-MFG [mm]
  rrect8% 1.3x1.4 smd paste+0 mask+0: 1(1.45,0) 2(-1.45,0)
  silkscreen extent -0.43,-0.95 2.79,0.95, body extent -2.2,-1.05 2.2,1.05, height 0.25
FP-WSL25125L000FEA_2512-MFG [mm]
  rrect5% 2.11x3.68 smd paste+0 mask+0: 1(-2.645,0) 2(2.645,0)
  silkscreen extent -1.21,-1.72 1.21,1.72, body extent -3.8,-1.94 3.8,1.94, height 0.25
G-188_MUR [mil]
  rect 34x32 smd paste+0 mask+0: 1(-28.5,0) 2(28.5,0)
  Top Layer keep-out region: -9.5,-14 -9.5,14 9.5,14 9.5,-14
  Keep-Out Layer region: -9.5,-16 -9.5,16 9.5,16 9.5,-16
  body extent -31,-16 31,16, height 35
JAE_DX07S024JJ2R1300 [mm] "Receptacle, USB 3.1 Type C, R/A, SMT"
  rrect37% 0.27x0.9 smd: A1(-2.625,7.55) A2(-2.125,7.55) A3(-1.625,7.55) A4(-1.125,7.55) A5(-0.625,7.55) A6(-0.125,7.55) A7(0.375,7.55) A8(0.875,7.55) A9(1.375,7.55) A10(1.875,7.55) A11(2.375,7.55) A12(2.875,7.55)
  round 0.3 hole 0.6 unplated mask+0.102: ALIGN1(-3.6,4.85)
  rrect100% 0.55x0.3 hole 0.5 slot 0.85 at 0 deg unplated mask+0.102: ALIGN2(3.6,4.915)
  rrect37% 0.27x0.8 smd: B1(2.625,5.95) B2(2.125,5.95) B3(1.625,5.95) B4(1.125,5.95) B5(0.625,5.95) B6(0.125,5.95) B7(-0.375,5.95) B8(-0.875,5.95) B9(-1.375,5.95) B10(-1.875,5.95) B11(-2.375,5.95) B12(-2.875,5.95)
  rrect100% 1.2x2.3 hole 0.6 slot 1.9 at 90 deg: S1(-4.32,6.85) S2(4.32,6.85)
  rrect100% 1.45x1.1 hole 0.7 slot 1.25 at 0 deg: S1(-3.995,6.25) S2(3.995,6.25)
  rrect100% 1.3x2.6 hole 0.7 slot 2 at 90 deg: S3(-4.32,1.8) S4(4.32,1.8)
  body extent -4.47,-0.5 4.47,7.67, height 3.14
JST_B4B-PH-K-S [mm]
  rect 1.308x1.308 / inner round 1.308 / far side rect 1.308x1.308 hole 0.8: 1(3,-0.55)
  round 1.308 hole 0.8: 2(1,-0.55) 3(-1,-0.55) 4(-3,-0.55)
  silkscreen extent -4.95,-3.05 4.95,2.25, body extent -4.95,-2.25 4.95,2.25, height 5.8
MSOP8_MC_MCH [mil]
  rect 60x18 smd paste+0 mask+0: 1(-80.5,38.39) 2(-80.5,12.8) 3(-80.5,-12.8) 4(-80.5,-38.39) 5(80.5,-38.39) 6(80.5,-12.8) 7(80.5,12.8) 8(80.5,38.39)
  silkscreen extent -64,-64 64,64, body extent -96,-59 96,59, height 43
RC0402N_VIS [mm]
  rect 0.656x0.5 smd paste+0 mask+0: 1(-0.553,0) 2(0.553,0)
  Top Layer keep-out region: -0.174,-0.199 -0.174,0.199 0.174,0.199 0.174,-0.199
  Keep-Out Layer region: -0.174,-0.25 -0.174,0.25 0.174,0.25 0.174,-0.25
  body extent -0.53,-0.25 0.53,0.25, height 0.71
RDN0011A-MFG [mm]
  rrect42% 1.2x0.475 smd paste-1000 mask-1000: 1(-1.4,1.962) 8(1.4,1.962)
  rrect57% 1.2x0.35 smd paste-1000 mask-1000: 2(-1.4,1.15) 3(-1.4,0.65) 6(1.4,0.65) 7(1.4,1.15)
  rrect13% 1.6x2.15 smd paste-1000 mask-1000: 4(-1.2,-1) 5(1.2,-1)
  rrect57% 0.35x0.9 smd paste-1000 mask-1000: 9(0.5,2.05) 11(-0.5,2.05)
  round 0.504 smd paste-1000 mask-1000: 10(0,1.005)
  Top Layer region: -0.2,2.4 -0.187,2.45 -0.15,2.487 -0.1,2.5 -0.1,2.5 0.1,2.5 0.15,2.487 0.187,2.45 0.2,2.4 0.2,2.4 0.2,1.515 0.203,1.5 0.212,1.487 0.225,1.478 0.24,1.475 0.24,1.475 0.24,1.475 0.26,1.47 0.275,1.455 0.28,1.435 0.28,1.435 0.28,-1.975 0.267,-2.025 0.23,-2.062 0.18,-2.075 0.18,-2.075 -0.18,-2.075 -0.23,-2.062 -0.267,-2.025 -0.28,-1.975 -0.28,-1.975 -0.28,1.435 -0.275,1.455 -0.26,1.47 -0.24,1.475 -0.24,1.475 -0.24,1.475 -0.225,1.478 -0.212,1.487 -0.203,1.5 -0.2,1.515 -0.2,1.515
  silkscreen extent -2.62,-2.42 2.1,2.6, body extent -1.75,-2.25 1.75,2.25, height 2.1
RSM0032B-MFG [mm]
  rrect50% 0.55x0.2 smd paste+0 mask+0: 1(-1.925,1.4) 2(-1.925,1) 3(-1.925,0.6) 4(-1.925,0.2) 5(-1.925,-0.2) 6(-1.925,-0.6) 7(-1.925,-1) 8(-1.925,-1.4) 17(1.925,-1.4) 18(1.925,-1) 19(1.925,-0.6) 20(1.925,-0.2) 21(1.925,0.2) 22(1.925,0.6) 23(1.925,1) 24(1.925,1.4)
  rrect50% 0.2x0.55 smd paste+0 mask+0: 9(-1.4,-1.925) 10(-1,-1.925) 11(-0.6,-1.925) 12(-0.2,-1.925) 13(0.2,-1.925) 14(0.6,-1.925) 15(1,-1.925) 16(1.4,-1.925) 25(1.4,1.925) 26(1,1.925) 27(0.6,1.925) 28(0.2,1.925) 29(-0.2,1.925) 30(-0.6,1.925) 31(-1,1.925) 32(-1.4,1.925)
  rrect4% 2.8x2.8 smd paste-1000 mask+0: 33(0,0)
  silkscreen extent -2.87,-2.05 2.05,2.05, body extent -2.3,-2.3 2.3,2.3, height 0.25
RUK0020B-MFG [mm]
  rrect50% 0.6x0.2 smd paste+0 mask+0: 1(-1.4,0.8) 2(-1.4,0.4) 3(-1.4,0) 4(-1.4,-0.4) 5(-1.4,-0.8) 11(1.4,-0.8) 12(1.4,-0.4) 13(1.4,0) 14(1.4,0.4) 15(1.4,0.8)
  rrect50% 0.2x0.6 smd paste+0 mask+0: 6(-0.8,-1.4) 7(-0.4,-1.4) 8(0,-1.4) 9(0.4,-1.4) 10(0.8,-1.4) 16(0.8,1.4) 17(0.4,1.4) 18(0,1.4) 19(-0.4,1.4) 20(-0.8,1.4)
  rrect6% 1.7x1.7 smd paste-1000 mask+0: 21(0,0)
  silkscreen extent -2.4,-1.55 1.55,1.55, body extent -1.8,-1.8 1.8,1.8, height 0.25
Samtec_SSW-106-01-x-S [mm] "Receptacle, 6x1, 2.54mm, TH"
  rect 1.55x1.55 hole 1.04: 1(-6.35,0)
  round 1.55 hole 1.04: 2(-3.81,0) 3(-1.27,0) 4(1.27,0) 5(3.81,0) 6(6.35,0)
  silkscreen extent -8.2,-1.21 7.87,1.21, body extent -7.87,-1.21 7.87,1.21, height 8.51
SM_RADIAL_10BMM [mm] "Nichicon 10x10"
  rect 4x2.5 smd: 1(-4,0) 2(4,0)
  silkscreen extent -5.25,-5.25 5.25,5.25, body extent -5.25,-5.25 5.25,5.25, height 10.5
SOT-363 [mm]
  rect 0.6x0.42 smd mask+0.051: 1(-0.95,0.65) 2(-0.95,0) 3(-0.95,-0.65) 4(0.95,-0.65) 5(0.95,0) 6(0.95,0.65)
  silkscreen extent -0.38,-1.02 0.38,1.02, body extent -1.1,-1.1 1.1,1.1, height 1.12
VQFN36_RRV_TEX [mil]
  rect 31.81x10.03 smd paste+0 mask+0: 1(-96.41,88.61) 2(-96.41,68.91) 3(-96.41,49.22) 4(-96.41,29.53) 5(-96.41,9.84) 6(-96.41,-9.85) 7(-96.41,-29.54) 8(-96.41,-49.22) 9(-96.41,-68.91) 10(-96.41,-88.61) 19(96.41,-88.61) 20(96.41,-68.91) 21(96.41,-49.22) 22(96.41,-29.54) 23(96.41,-9.85) 24(96.41,9.84) 25(96.41,29.53) 26(96.41,49.22) 27(96.41,68.91) 28(96.41,88.61)
  rect 10.03x31.81 smd paste+0 mask+0: 11(-68.91,-115.91) 12(-49.23,-115.91) 13(-29.54,-115.91) 14(-9.85,-115.91) 15(9.85,-115.91) 16(29.53,-115.91) 17(49.22,-115.91) 18(68.91,-115.91) 29(68.91,115.91) 30(49.22,115.91) 31(29.53,115.91) 32(9.85,115.91) 33(-9.85,115.91) 34(-29.54,115.91) 35(-49.23,115.91) 36(-68.91,115.91)
  rect 146x185 smd paste+0 mask+0: 37(0,0)
  silkscreen extent -132,-125 132,152, body extent -101,-120 101,120, height 39

## Part data
C1 C15: library part CMP-0006279-2, "CAP, CERM, 0.1 uF, 50 V, +/- 10%, X5R, 0402", Cap_Case=0402, Manufacturer=TDK, Supplier Part Number 1=445-5942-1-ND, TempCo=X5R, Tolerance_%=10%, Value1="0.039064 ohm", Value2=50V, ValueDisplayed=0.1uF, AEC Category=Q200, AEC Grade=N/A, AEC Qualified=N, Cap_F=100nF, ComponentLink1Description="Datasheet link", ComponentLink1URL=https://product.tdk.com/en/search/capacitor/ceramic/mlcc/info?part_no=C1005X5R1H104K050BB, CompType=Capacitor, ESR_ohm=39.064m, IRMS_A=814.669mA, LatestRevisionDate=2017-03-09, MountType=SMT, PackageReference=0402, PartNumber=C1005X5R1H104K050BB, Polarized=N, Published=2008-06-19, Publisher="Texas Instruments", RoHS=Y, SizeArea_mm2=0.5, SizeAreaWB_mm2=3, SizeX_mm=1, SizeY_mm=0.5, SizeZ_mm=0.6, Supplier 1=Digi-Key, Supplier 2=Mouser, Supplier Part Number 2=810-C1005X5R1H104K050BB, TaMax_C=85°C, TaMin_C=-55°C, Technology=Ceramic, U/M=EA, VDC_V=50V
C2 C11: library part CMP-0007470-4, "CAP, CERM, 0.1 uF, 100 V, +/- 10%, X7R, 0603", Cap_Case=0603, Manufacturer=MuRata, Supplier Part Number 1=490-6439-1-ND, TempCo=X7R, Tolerance_%=10%, Value1=Unknown, Value2=100V, ValueDisplayed=0.1uF, AEC Category=Q200, AEC Qualified=?, Cap_F=100nF, ComponentLink1Description="Datasheet link", ComponentLink1URL=http://search.murata.co.jp/Ceramy/image/img/A01X/G101/ENG/GRM188R72A104KA35-01.pdf, CompType=Capacitor, LatestRevisionDate=2017-03-09, MountType=SMT, PackageReference=0603, PartNumber=GRM188R72A104KA35J, Polarized=N, Published=2008-06-19, Publisher="Texas Instruments", RoHS=Y, SizeArea_mm2=1.28, SizeAreaWB_mm2=4.68, SizeX_mm=1.6, SizeY_mm=0.8, SizeZ_mm=1, Supplier 1=Digi-Key, Supplier 2=Mouser, Supplier Part Number 2=81-GRM188R72A104KA5J, TaMax_C=125°C, TaMin_C=-55°C, Technology=Ceramic, U/M=EA, VDC_V=100V
C3 C80: library part CMP-0098058-1, "4.7 µF ±10% 100V Ceramic Capacitor X5R 0805 (2012 Metric)", Digikey Part Number=445-C2012X5R2A475K125ACCT-ND, Manufacturer=TDK, Mouser Part Number=810-C2012X5R2A475K12, Operating Temperature Range="-55°C to +85°C", TempCo=15%, Temperature Characteristic=X5R, Tolerance_%=10%, ValueDisplayed=4.7uF, AEC Qualified=No, Cap_F=4.7µF, ComponentLink1Description=Datasheet, ComponentLink1URL=https://product.tdk.com/en/search/capacitor/ceramic/mlcc/info?part_no=C2012X5R2A475K125AC, Datasheet=https://product.tdk.com/en/search/capacitor/ceramic/mlcc/info?part_no=C2012X5R2A475K125AC, Datasheet Path=datasheets/Cap-C2012X5R2A475K125AC.pdf, Digikey Description="CAP CER 4.7UF 100V X5R 0805", HelpURL=https://upverter.com/upn/revision/d7b95d178f122935/, Lead Free=Yes, Mouser Description="Multilayer Ceramic Chip Capacitors, Capacitance=4.7µF, LxWxT: 2x1.25x1.25mm", PackageReference=0805, Part Number=C2012X5R2A475K125AC, PartNumber=C2012X5R2A475K125AC, RoHS=TRUE, SizeZ_mm=1.5mm, Supplier 1=Digikey, Supplier 2=Mouser, Supplier Part Number 1=445-C2012X5R2A475K125ACCT-ND, Supplier Part Number 2=810-C2012X5R2A475K12, VDC_V=100V
C4 C5: library part CMP-0006977-4, "CAP, CERM, 0.01 uF, 100 V, +/- 10%, X7R, 0603", Cap_Case=0603, Manufacturer=Kemet, Supplier Part Number 1=399-5347-1-ND, TempCo=X7R, Tolerance_%=10%, Value1=Unknown, Value2=100V, ValueDisplayed=0.01uF, AEC Category=Q200, AEC Qualified=?, Cap_F=10nF, ComponentLink1Description="Datasheet link", ComponentLink1URL=http://www.kemet.com/kemet/web/homepage/kechome.nsf/vapubfiles/F3102_Y5V.pdf/$file/F3102_Y5V.pdf, CompType=Capacitor, LatestRevisionDate=2017-03-09, MountType=SMT, PackageReference=0603, PartNumber=C0603X103K1RACTU, Polarized=N, Published=2008-06-19, Publisher="Texas Instruments", RoHS=Y, SizeArea_mm2=1.28, SizeAreaWB_mm2=4.68, SizeX_mm=1.6, SizeY_mm=0.8, SizeZ_mm=1, Supplier 1=Digi-Key, Supplier 2=Mouser, Supplier Part Number 2=80-C0603X103K1R, TaMax_C=125°C, TaMin_C=-55°C, Technology=Ceramic, U/M=EA, VDC_V=100V
C6 C32 C33 C34 C35 C38 C39 C44 C50: library part CMP-0081011-1, "CAP, CERM, 0.1 µF, 100 V,+/- 10%, X7R, AEC-Q200 Grade 1, 0603", Cap_Case=0603, Manufacturer="Taiyo Yuden", Supplier Part Number 1=587-6009-1-ND, TempCo=X7R, Tolerance_%=10%, Value2=100V, ValueDisplayed=0.1µF, AEC Category=Q200, AEC Grade=1, AEC Qualified=Y, Cap_F=100nF, ComponentLink1Description="Datasheet link", ComponentLink1URL=http://ds.yuden.co.jp/TYCOMPAS/ut/detail.do?productNo=HMK107B7104KAHT&fileName=HMK107B7104KAHT_SS&mode=specSheetDownload, CompType=Capacitor, MountType=SMT, PackageReference=0603, PartNumber=HMK107B7104KAHT, Polarized=N, RoHS=Y, SizeArea_mm2=1.28, SizeAreaWB_mm2=4.68, SizeX_mm=1.6, SizeY_mm=0.8, SizeZ_mm=1, Supplier 1=Digi-Key, Supplier 2=Mouser, Supplier Part Number 2=963-HMK107B7104KAHT, TaMax_C=125°C, TaMin_C=-55°C, Technology=Ceramic, U/M=EA, VDC_V=100V
C8 C9: library part CMP-0009652-3, "CAP, CERM, 220 pF, 50 V, +/- 10%, X7R, AEC-Q200 Grade 1, 0201", Cap_Case=0201_033, Manufacturer=TDK, Supplier Part Number 1=445-12109-1-ND, TempCo=X7R, Tolerance_%=10%, Value1="11.6275 ohm", Value2=50V, ValueDisplayed=220pF, AEC Category=Q200, AEC Grade=1, AEC Qualified=Y, Cap_F=220pF, ComponentLink1Description="Datasheet link", ComponentLink1URL=https://product.tdk.com/en/search/capacitor/ceramic/mlcc/info?part_no=CGA1A2X7R1H221K030BA, CompType=Capacitor, ESR_ohm=11.6275, IRMS_A=200.785mA, LatestRevisionDate=2017-03-09, MountType=SMT, PackageReference=0201, PartNumber=CGA1A2X7R1H221K030BA, Polarized=N, Published=2008-06-19, Publisher="Texas Instruments", RoHS=Y, SizeArea_mm2=0.18, SizeAreaWB_mm2=2.08, SizeX_mm=0.6, SizeY_mm=0.3, SizeZ_mm=0.33, Supplier 1=Digi-Key, Supplier 2=Mouser, Supplier Part Number 2=810-CGA1A2X7R1H221K030BA, TaMax_C=125°C, TaMin_C=-55°C, Technology=Ceramic, U/M=EA, VDC_V=50V
C10: library part CMP-0006228-1, "CAP, CERM, 0.1 uF, 16 V, +/- 10%, X7R, 0402", Cap_Case=0402, Manufacturer="Wurth Elektronik", Supplier Part Number 1=732-7532-1-ND, TempCo=X7R, Tolerance_%=10%, Value1=Unknown, Value2=16V, ValueDisplayed=0.1uF, AEC Category=Q200, AEC Grade=N/A, AEC Qualified=N, Cap_F=100nF, ComponentLink1Description="Datasheet link", ComponentLink1URL=http://katalog.we-online.de/pbs/datasheet/885012205037.pdf, CompType=Capacitor, LatestRevisionDate=2017-03-09, MountType=SMT, PackageReference=0402, PartNumber=885012205037, Polarized=N, Published=2008-06-19, Publisher="Texas Instruments", RoHS=Y, SizeArea_mm2=0.5, SizeAreaWB_mm2=3, SizeX_mm=1, SizeY_mm=0.5, SizeZ_mm=0.6, Supplier 1=Digi-Key, Supplier 2=Mouser, Supplier Part Number 2=710-885012205037, TaMax_C=125°C, TaMin_C=-55°C, Technology=Ceramic, U/M=EA, VDC_V=16V
C12: library part CMP-0006325-2, "CAP, CERM, 0.1 uF, 50 V, +/- 10%, X7R, AEC-Q200 Grade 1, 0402", Cap_Case=0402, Manufacturer=TDK, Supplier Part Number 1=445-6899-1-ND, TempCo=X7R, Tolerance_%=10%, Value1="0.039064 ohm", Value2=50V, ValueDisplayed=0.1uF, AEC Category=Q200, AEC Grade=1, AEC Qualified=Y, Cap_F=100nF, ComponentLink1Description="Datasheet link", ComponentLink1URL=https://product.tdk.com/en/search/capacitor/ceramic/mlcc/info?part_no=CGA2B3X7R1H104K050BB, CompType=Capacitor, ESR_ohm=39.064m, IRMS_A=814.669mA, LatestRevisionDate=2017-03-09, MountType=SMT, PackageReference=0402, PartNumber=CGA2B3X7R1H104K050BB, Polarized=N, Published=2008-06-19, Publisher="Texas Instruments", RoHS=Y, SizeArea_mm2=0.5, SizeAreaWB_mm2=3, SizeX_mm=1, SizeY_mm=0.5, SizeZ_mm=0.6, Supplier 1=Digi-Key, Supplier 2=Newark, Supplier 3=Mouser, Supplier Part Number 2=04X3148, Supplier Part Number 3=810-CGA2B3X7R1H104K, TaMax_C=125°C, TaMin_C=-55°C, Technology=Ceramic, U/M=EA, VDC_V=50V
C13 C14: library part CMP-0007344-5, "CAP, CERM, 10 uF, 25 V, +/- 20%, X5R, 0603", Cap_Case=0603, Manufacturer=MuRata, Supplier Part Number 1=490-7202-1-ND, TempCo=X5R, Tolerance_%=20%, Value1=Unknown, Value2=25V, ValueDisplayed=10uF, AEC Category=Q200, AEC Qualified=?, Cap_F=10µF, ComponentLink1Description="Datasheet link", ComponentLink1URL=http://psearch.murata.com/capacitor/product/GRM188R61E106MA73%23.pdf, CompType=Capacitor, LatestRevisionDate=2017-03-09, MountType=SMT, PackageReference=0603, PartNumber=GRM188R61E106MA73D, Polarized=N, Published=2008-06-19, Publisher="Texas Instruments", RoHS=Y, SizeArea_mm2=1.28, SizeAreaWB_mm2=4.68, SizeX_mm=1.6, SizeY_mm=0.8, SizeZ_mm=1, Supplier 1=Digi-Key, Supplier 2=Mouser, Supplier 3=Farnell, Supplier Part Number 2=81-GRM188R61E106MA3L, Supplier Part Number 3=1828803RL, TaMax_C=85°C, TaMin_C=-55°C, Technology=Ceramic, U/M=EA, VDC_V=25V
C16 C17 C18: library part CMP-0006339-4, "CAP, CERM, 10 uF, 10 V, +/- 20%, X5R, 0402", Cap_Case=0402, Manufacturer="Samsung Electro-Mechanics", TempCo=X5R, Tolerance_%=20%, Value1=Unknown, Value2=10V, ValueDisplayed=10uF, AEC Category=Q200, AEC Grade=N/A, AEC Qualified=N, Cap_F=10µF, ComponentLink1Description="Datasheet link", ComponentLink1URL=http://www.samsungsem.com/kr/support/product-search/mlcc/__icsFiles/afieldfile/2018/06/21/CL05A106MP5NUNC.pdf, CompType=Capacitor, MountType=SMT, PackageReference=0402, PartNumber=CL05A106MP5NUNC, Polarized=N, RoHS=Y, SizeArea_mm2=0.5, SizeAreaWB_mm2=3, SizeX_mm=1, SizeY_mm=0.5, SizeZ_mm=0.6, TaMax_C=85°C, TaMin_C=-55°C, Technology=Ceramic, U/M=EA, VDC_V=10V
C19 C20 C28: library part CMP-0007891-2, "CAP, CERM, 1 uF, 100 V, +/- 10%, X7S, 0805", Cap_Case=0805, Manufacturer=TDK, Supplier Part Number 1=445-5205-1-ND, TempCo=X7S, Tolerance_%=10%, Value1="0.008255 ohm", Value2=100V, ValueDisplayed=1uF, AEC Category=Q200, AEC Grade=N/A, AEC Qualified=N, Cap_F=1µF, ComponentLink1Description="Datasheet link", ComponentLink1URL=https://product.tdk.com/en/search/capacitor/ceramic/mlcc/info?part_no=C2012X7S2A105K125AB, CompType=Capacitor, ESR_ohm=8.255m, IRMS_A=2.2744A, LatestRevisionDate=2017-03-09, MountType=SMT, PackageReference=0805, PartNumber=C2012X7S2A105K125AB, Polarized=N, Published=2008-06-19, Publisher="Texas Instruments", RoHS=Y, SizeArea_mm2=2.5, SizeAreaWB_mm2=6.75, SizeX_mm=2, SizeY_mm=1.25, SizeZ_mm=1.45, Supplier 1=Digi-Key, Supplier 2=Newark, Supplier 3=Mouser, Supplier Part Number 2=90R8332, Supplier Part Number 3=810-C2012X7S2A105K, TaMax_C=125°C, TaMin_C=-55°C, Technology=Ceramic, U/M=EA, VDC_V=100V
C21: library part CMP-0008724-2, "CAP, CERM, 2.2 uF, 100 V, +/- 10%, X7S, 1206", Cap_Case=1206_180, Manufacturer=TDK, Supplier Part Number 1=445-5207-1-ND, TempCo=X7S, Tolerance_%=10%, Value1="0.005718 ohm", Value2=100V, ValueDisplayed=2.2uF, AEC Category=Q200, AEC Grade=N/A, AEC Qualified=N, Cap_F=2.2µF, ComponentLink1Description="Datasheet link", ComponentLink1URL=https://product.tdk.com/en/search/capacitor/ceramic/mlcc/info?part_no=C3216X7S2A225K160AB, CompType=Capacitor, ESR_ohm=5.718m, IRMS_A=3.0363A, LatestRevisionDate=2017-03-09, MountType=SMT, PackageReference=1206, PartNumber=C3216X7S2A225K160AB, Polarized=N, Published=2008-06-19, Publisher="Texas Instruments", RoHS=Y, SizeArea_mm2=5.12, SizeAreaWB_mm2=10.92, SizeX_mm=3.2, SizeY_mm=1.6, SizeZ_mm=1.8, Supplier 1=Digi-Key, Supplier 2=Mouser, Supplier Part Number 2=810-C3216X7S2A225K160AB, TaMax_C=125°C, TaMin_C=-55°C, Technology=Ceramic, U/M=EA, VDC_V=100V
C22: library part CMP-0006618-1, "CAP, CERM, 0.1 uF, 100 V, +/- 10%, X5R, 0402", Cap_Case=0402, Manufacturer=MuRata, Supplier Part Number 1=490-10458-1-ND, TempCo=X5R, Tolerance_%=10%, Value1=Unknown, Value2=100V, ValueDisplayed=0.1uF, AEC Category=Q200, AEC Grade=N/A, AEC Qualified=N, Cap_F=100nF, ComponentLink1Description="Datasheet link", ComponentLink1URL=http://psearch.en.murata.com/capacitor/product/GRM155R62A104KE14%23.pdf, CompType=Capacitor, LatestRevisionDate=2017-03-09, MountType=SMT, PackageReference=0402, PartNumber=GRM155R62A104KE14D, Polarized=N, Published=2008-06-19, Publisher="Texas Instruments", RoHS=Y, SizeArea_mm2=0.5, SizeAreaWB_mm2=3, SizeX_mm=1, SizeY_mm=0.5, SizeZ_mm=0.6, Supplier 1=Digi-Key, Supplier 2=Newark, Supplier 3=Mouser, Supplier Part Number 2=96Y9228, Supplier Part Number 3=81-GRM155R62A104KE4D, TaMax_C=85°C, TaMin_C=-55°C, Technology=Ceramic, U/M=EA, VDC_V=100V
C23: library part CMP-00860000-2, "CAPACITOR, X5R, 0402, 16V, 1UF", Manufacturer=AVX, TempCo=15%, Tolerance_%=10%, AEC Qualified=No, ComponentLink1Description=Datasheet, ComponentLink1URL=http://datasheets.avx.com/cx5r.pdf, PackageReference=0402, PartNumber=0402YD105KAT2A, RoHS=TRUE, SizeZ_mm=0.56mm, Symbol Name=SYM-0402YD105KAT2A, VDC_V=16V
C24: library part CMP-0064914-1, "CAP, CERM, 10 pF, 10 V,+/- 2.5%, C0G/NP0, 0402", Cap_Case=0402, Manufacturer=Kemet, Supplier Part Number 1=399-8939-1-ND, TempCo=C0G/NP0, Tolerance_%=2.5%, Value1=Unknown, Value2=10V, ValueDisplayed=10pF, AEC Category=Q200, AEC Grade=N/A, AEC Qualified=N, Cap_F=10pF, ComponentLink1Description="Datasheet link", ComponentLink1URL=http://www.kemet.com/docfinder?Partnumber=C0402C100C8GACTU, CompType=Capacitor, LatestRevisionDate=2017-06-05, MountType=SMT, PackageReference=0402, PartNumber=C0402C100C8GACTU, Polarized=N, Published=2008-06-19, Publisher="Texas Instruments", RoHS=Y, SizeArea_mm2=0.5, SizeAreaWB_mm2=3, SizeX_mm=1, SizeY_mm=0.5, SizeZ_mm=0.6, Supplier 1=Digi-Key, Supplier 2=Newark, Supplier 3=Mouser, Supplier Part Number 2=96Y6847, Supplier Part Number 3=80-C0402C100C8G, TaMax_C=125°C, TaMin_C=-55°C, Technology=Ceramic, U/M=EA, VDC_V=10V
C25 C26: library part CMP-0007108-2, "CAP, CERM, 22 uF, 10 V, +/- 20%, X5R, 0603", Cap_Case=0603, Manufacturer="Samsung Electro-Mechanics", TempCo=X5R, Tolerance_%=20%, Value1=Unknown, Value2=10V, ValueDisplayed=22uF, AEC Category=Q200, AEC Qualified=?, Cap_F=22µF, ComponentLink1Description="Datasheet link", ComponentLink1URL=http://www.samsungsem.com/servlet/FileDownload?type=spec&file=CL10A226MP8NUNE.pdf, CompType=Capacitor, LatestRevisionDate=2017-03-09, MountType=SMT, PackageReference=0603, PartNumber=CL10A226MP8NUNE, Polarized=N, Published=2008-06-19, Publisher="Texas Instruments", RoHS=Y, SizeArea_mm2=1.28, SizeAreaWB_mm2=4.68, SizeX_mm=1.6, SizeY_mm=0.8, SizeZ_mm=1, TaMax_C=85°C, TaMin_C=-55°C, Technology=Ceramic, U/M=EA, VDC_V=10V
C27: library part CMP-0007091-5, "CAP, CERM, 2.2 uF, 10 V, +/- 10%, X5R, AEC-Q200 Grade 3, 0603", Cap_Case=0603, Manufacturer=TDK, Supplier Part Number 1=445-12444-1-ND, TempCo=X5R, Tolerance_%=10%, Value1=Unknown, Value2=10V, ValueDisplayed=2.2uF, AEC Category=Q200, AEC Grade=3, AEC Qualified=Y, Cap_F=2.2µF, ComponentLink1Description="Datasheet link", ComponentLink1URL=https://product.tdk.com/info/en/documents/chara_sheet/CGA3E3X5R1A225K080AB.pdf, CompType=Capacitor, LatestRevisionDate=2017-03-09, MountType=SMT, PackageReference=0603, PartNumber=CGA3E3X5R1A225K080AB, Polarized=N, Published=2008-06-19, Publisher="Texas Instruments", RoHS=Y, SizeArea_mm2=1.28, SizeAreaWB_mm2=4.68, SizeX_mm=1.6, SizeY_mm=0.8, SizeZ_mm=1, Supplier 1=Digi-Key, Supplier 2=Newark, Supplier 3=Mouser, Supplier Part Number 3=810-CGA3E3X5R1A225KB, TaMax_C=85°C, TaMin_C=-55°C, Technology=Ceramic, U/M=EA, VDC_V=10V